# Altium PCB External_Camera_HAT.PcbDoc (part 1 of 3)
Units mm, origin at the board's own origin, x right, y up, seen from the top; angles counter-clockwise.
Board outline 65 x 56 mm, 4 copper layers (Top Layer, GND Top, GND Bottom, Bottom Layer), stack 1.586 mm thick; 123 components, 112 nets, 537 pads, 357 vias.
Unrouted connection lines stored in the file: 85.
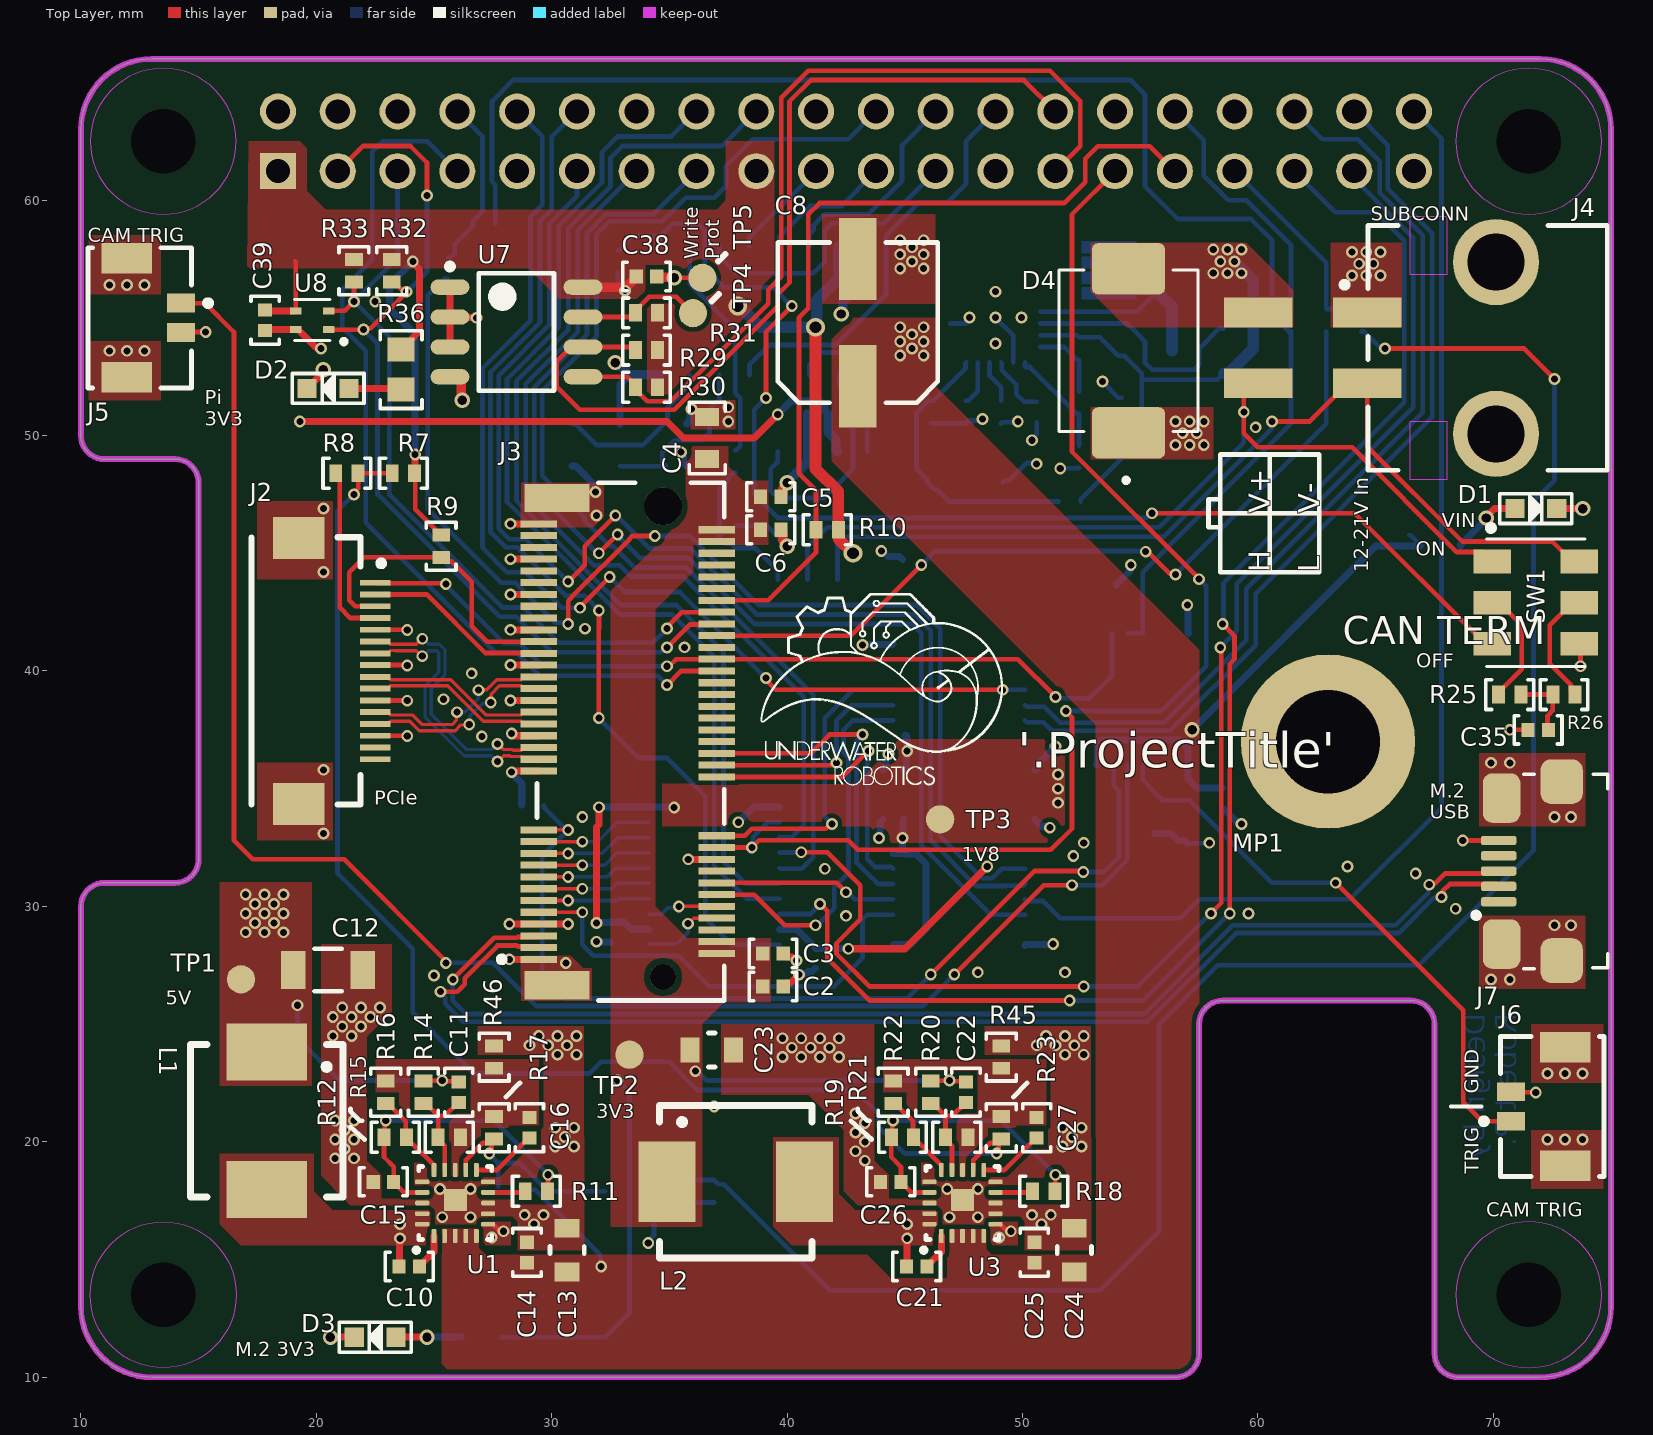
[diagram p0: Top Layer view]
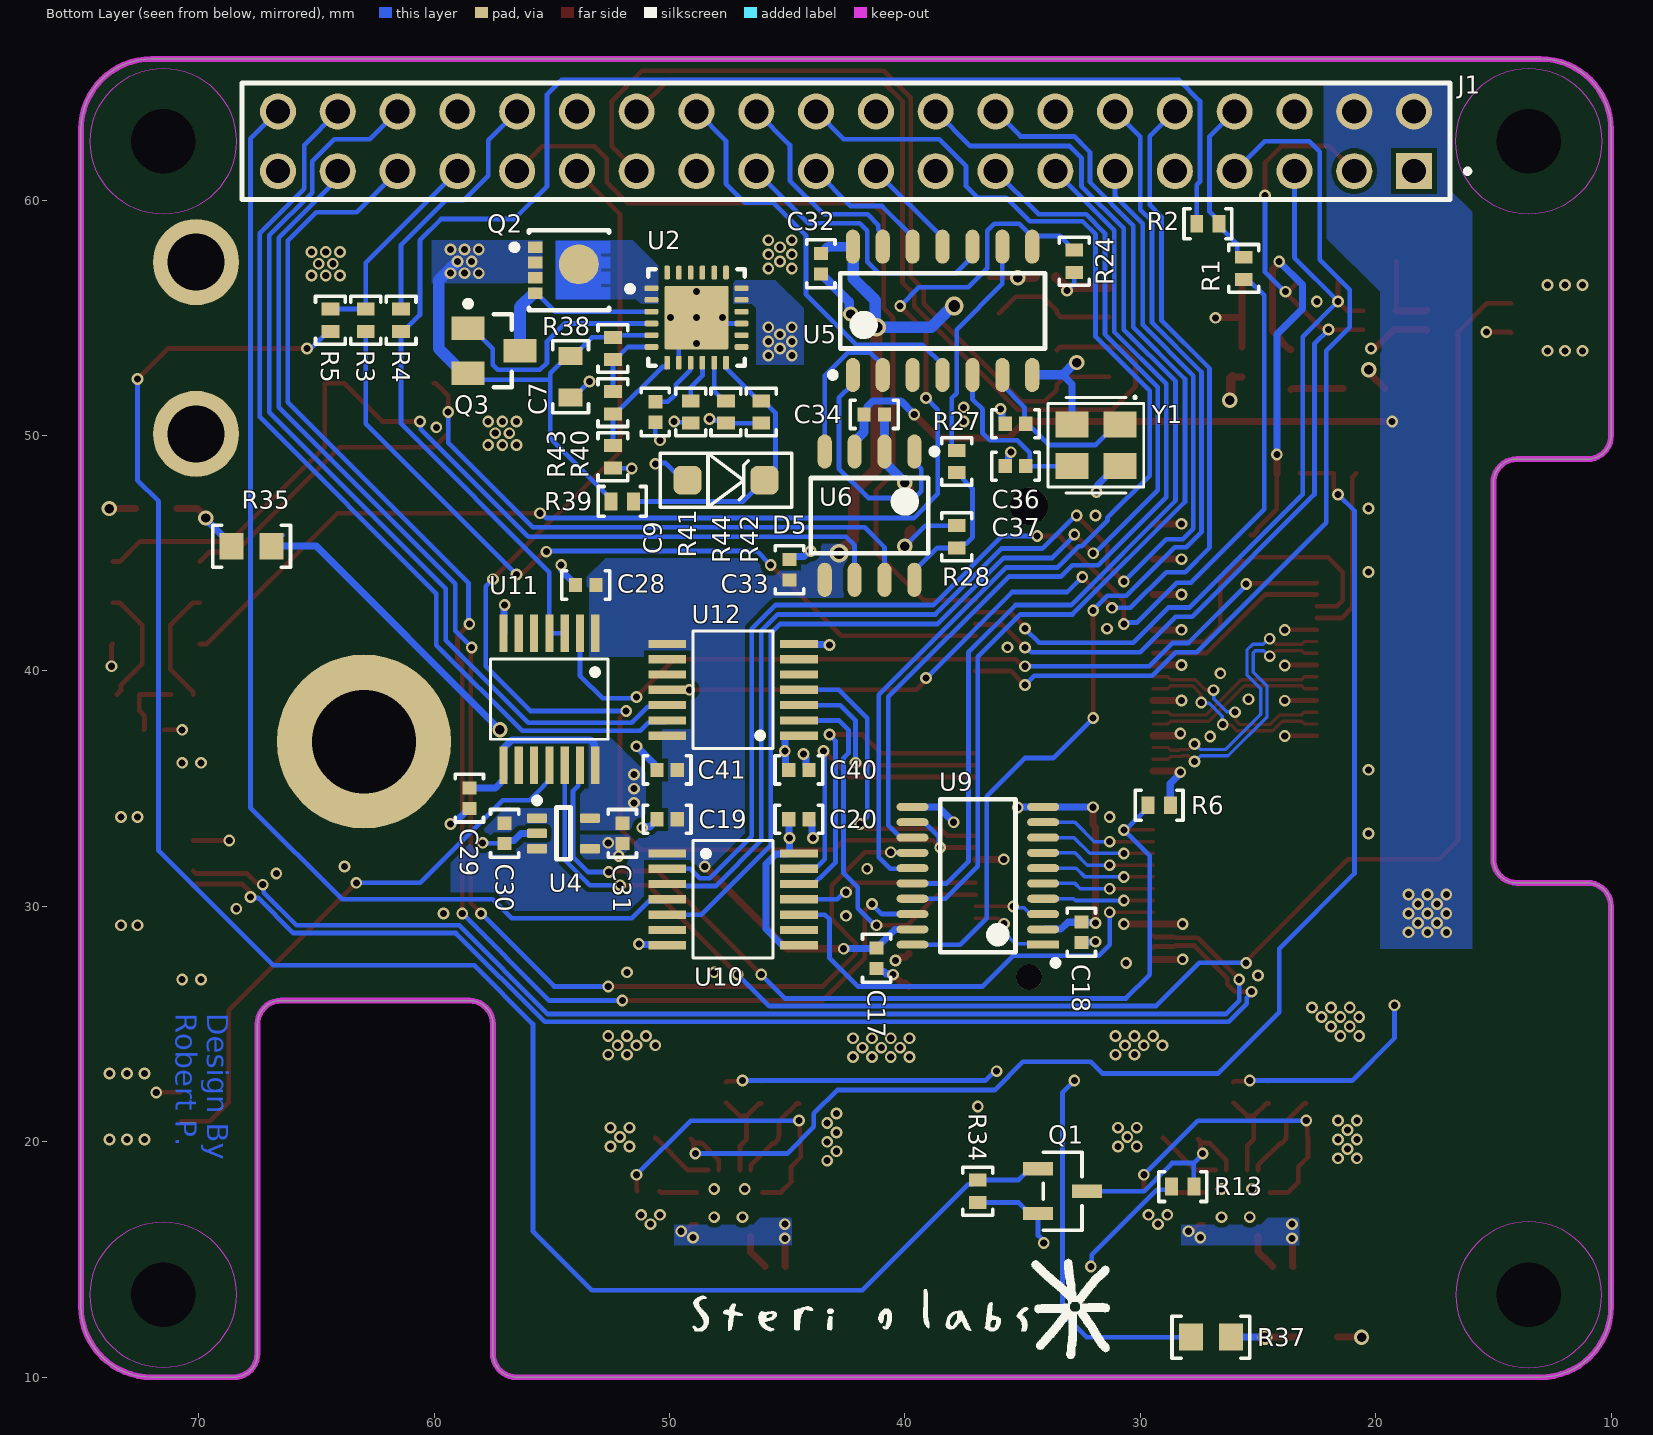
[diagram p1: Bottom Layer view, seen from below]
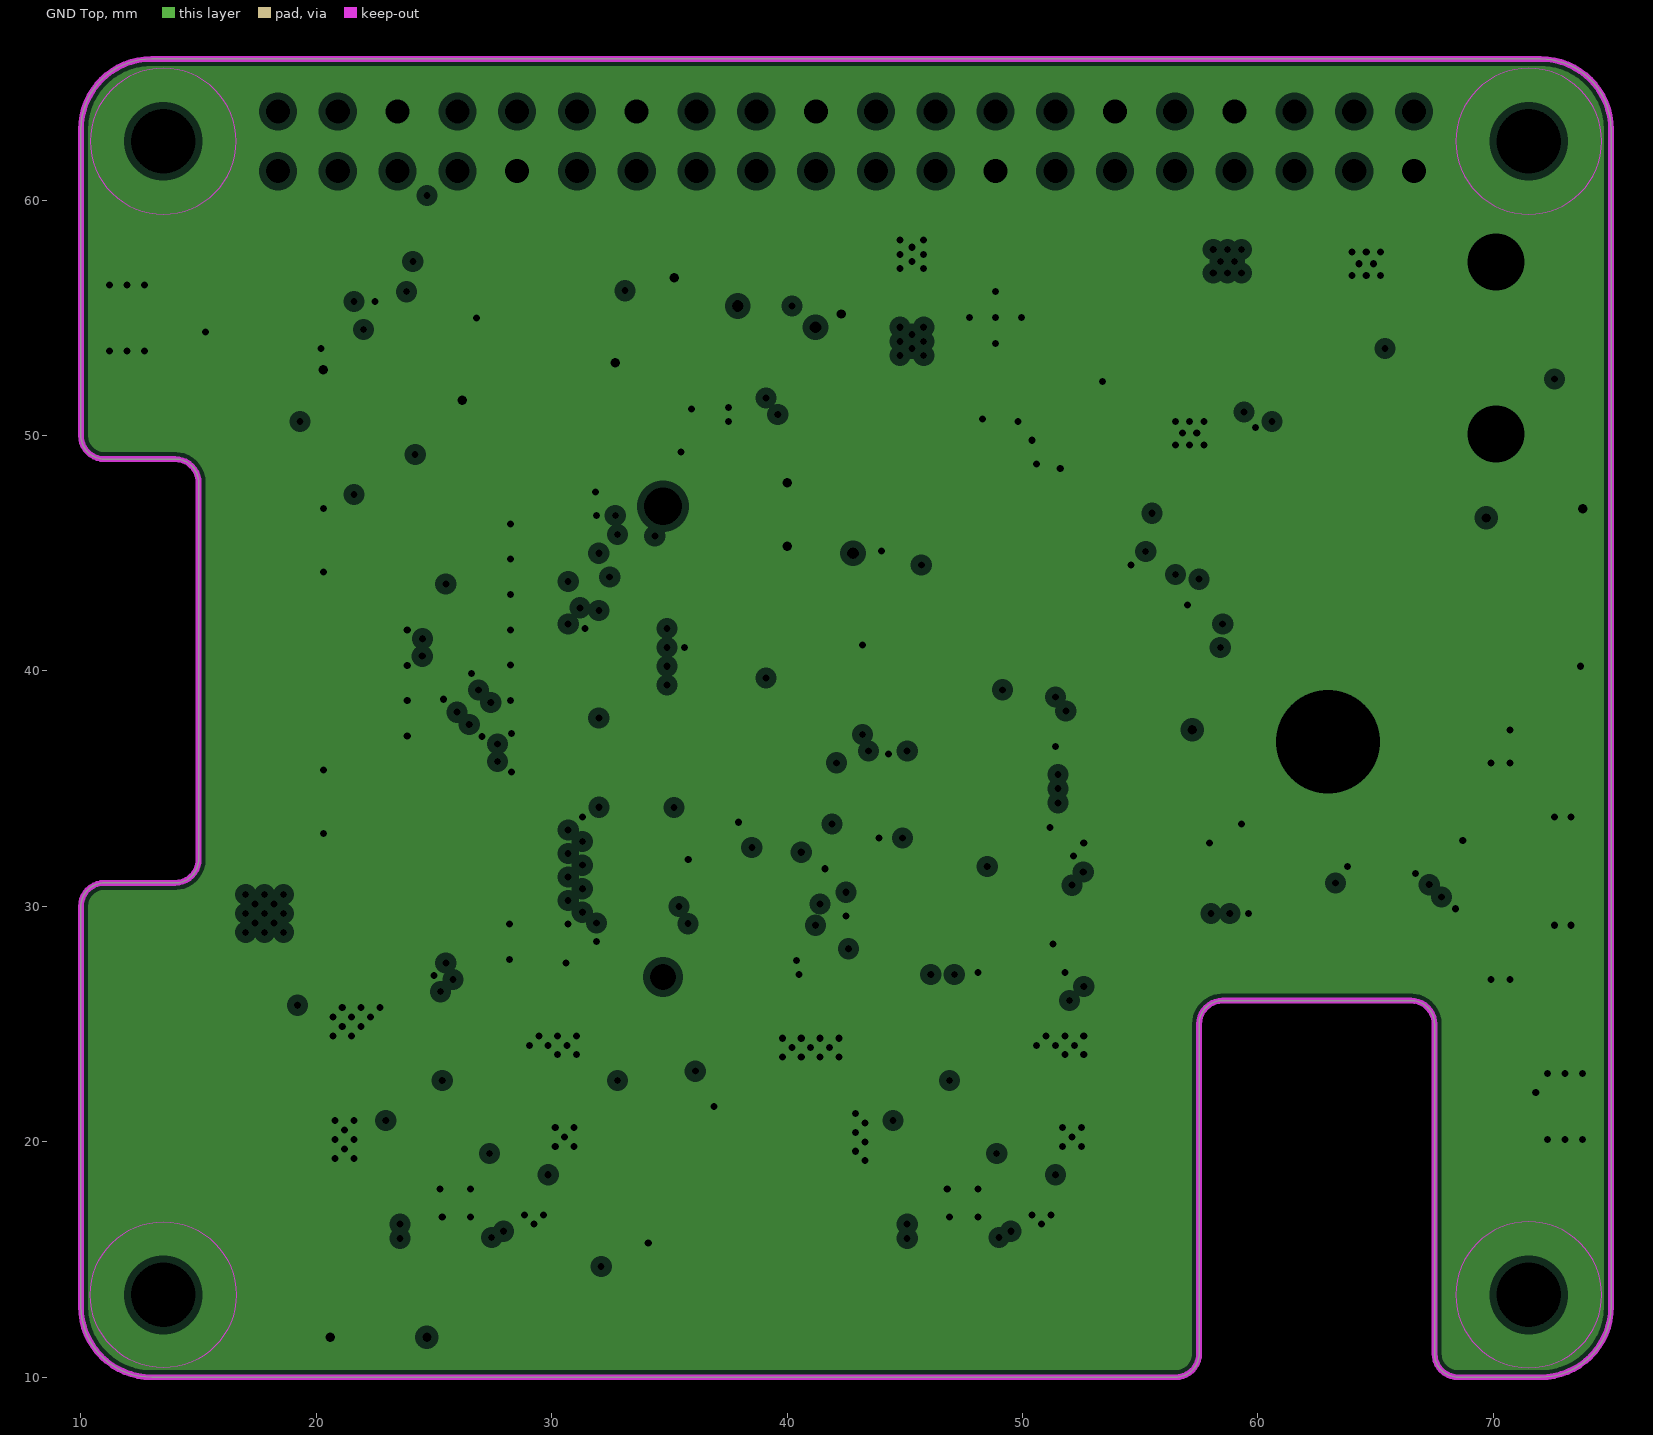
[diagram p2: GND Top, clearances drawn from the general rule]
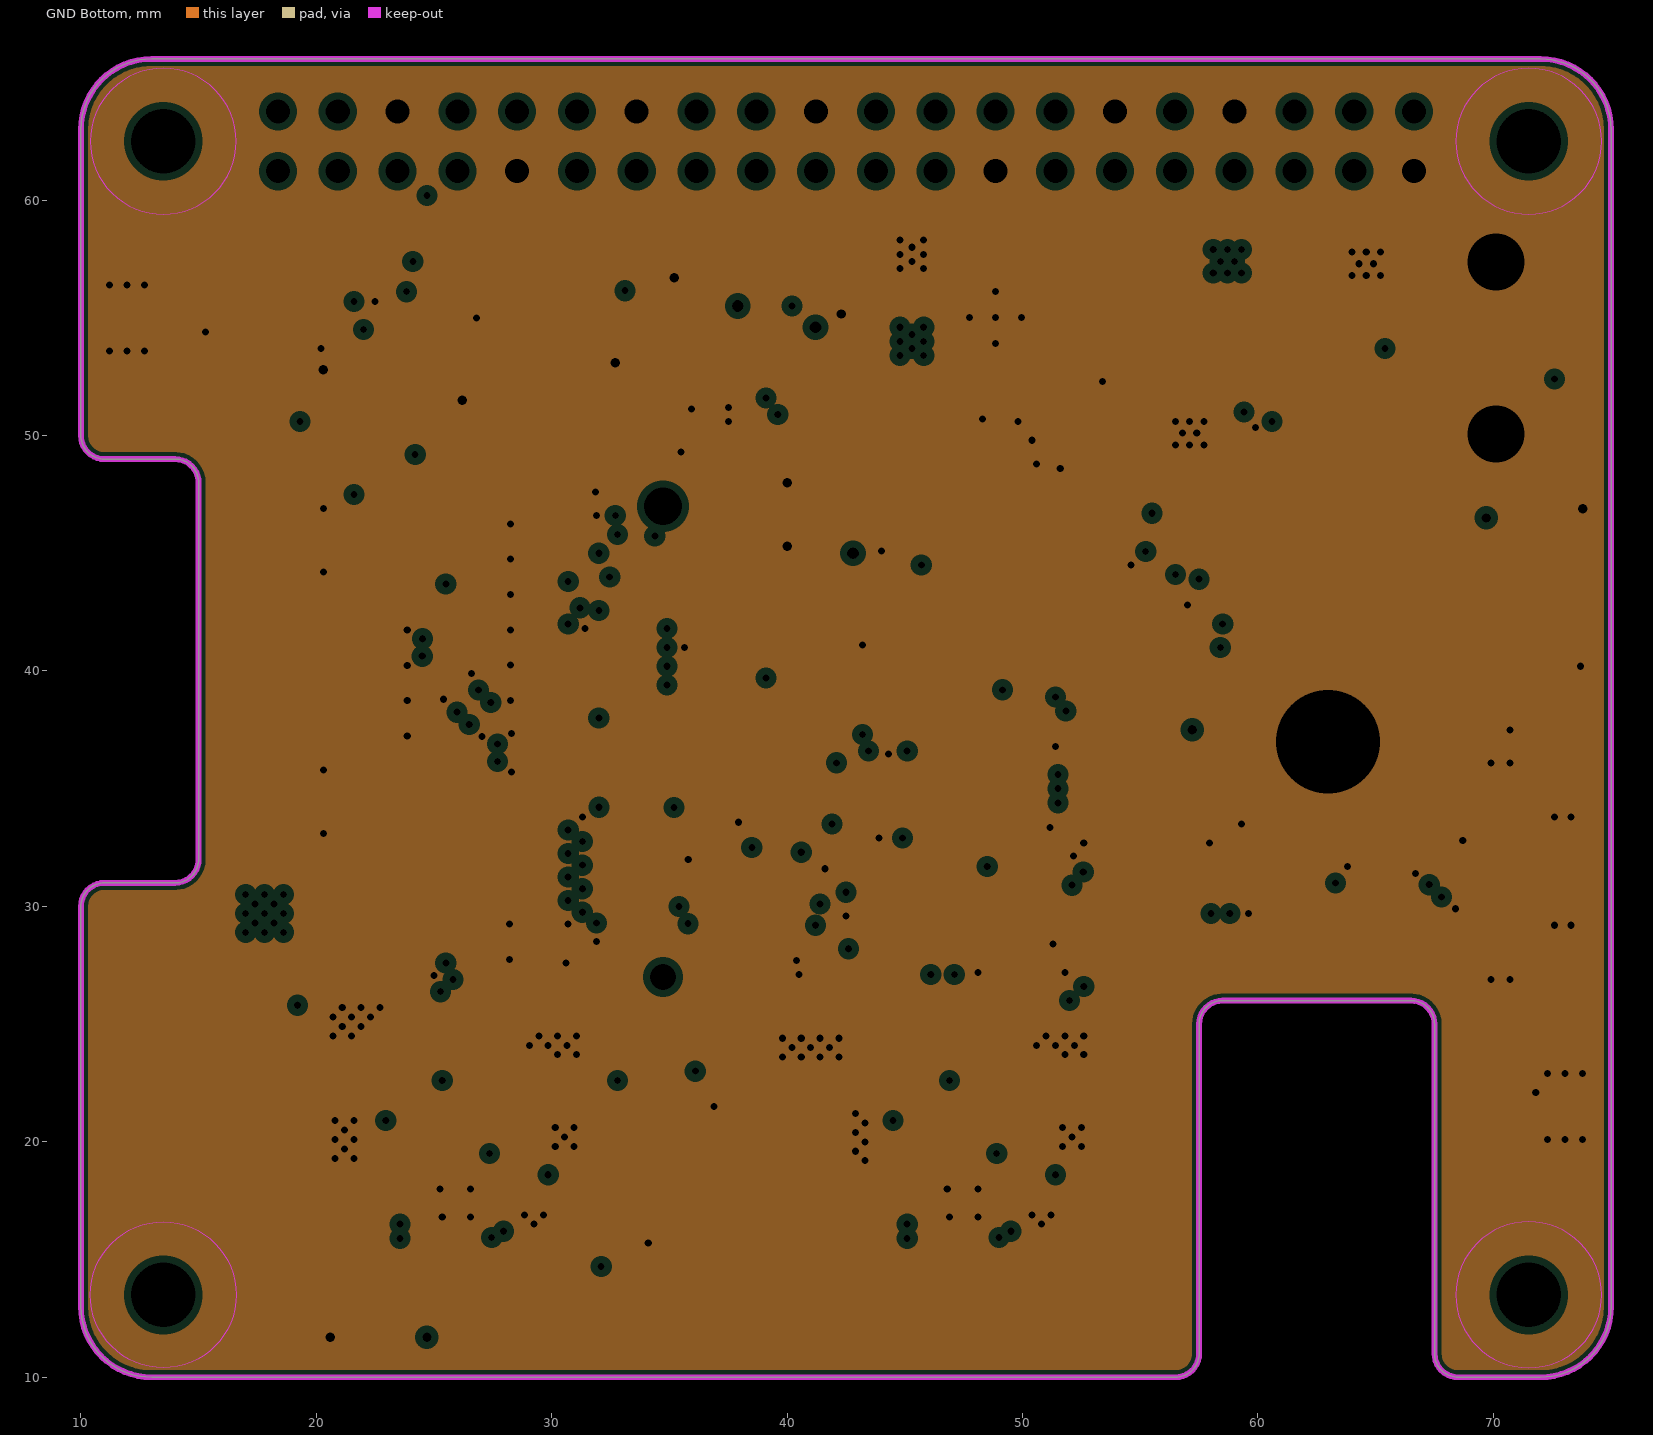
[diagram p3: GND Bottom, clearances drawn from the general rule]
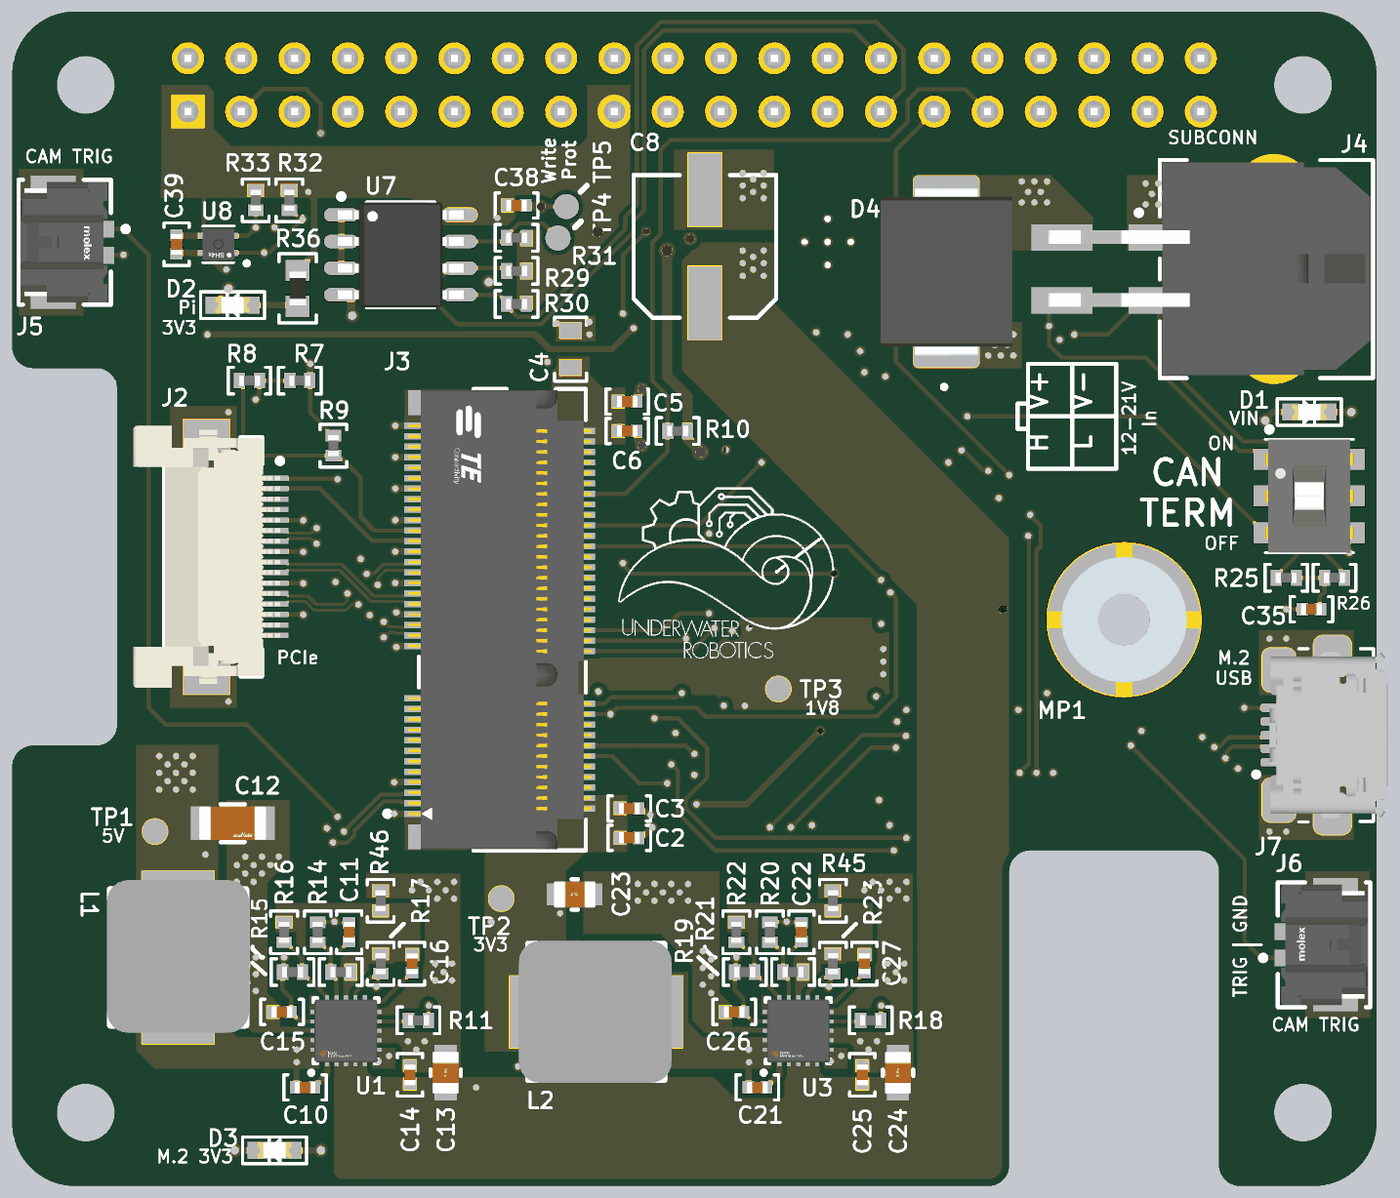
[diagram p5: 3D render of the assembled board from above, using the file's embedded part models]
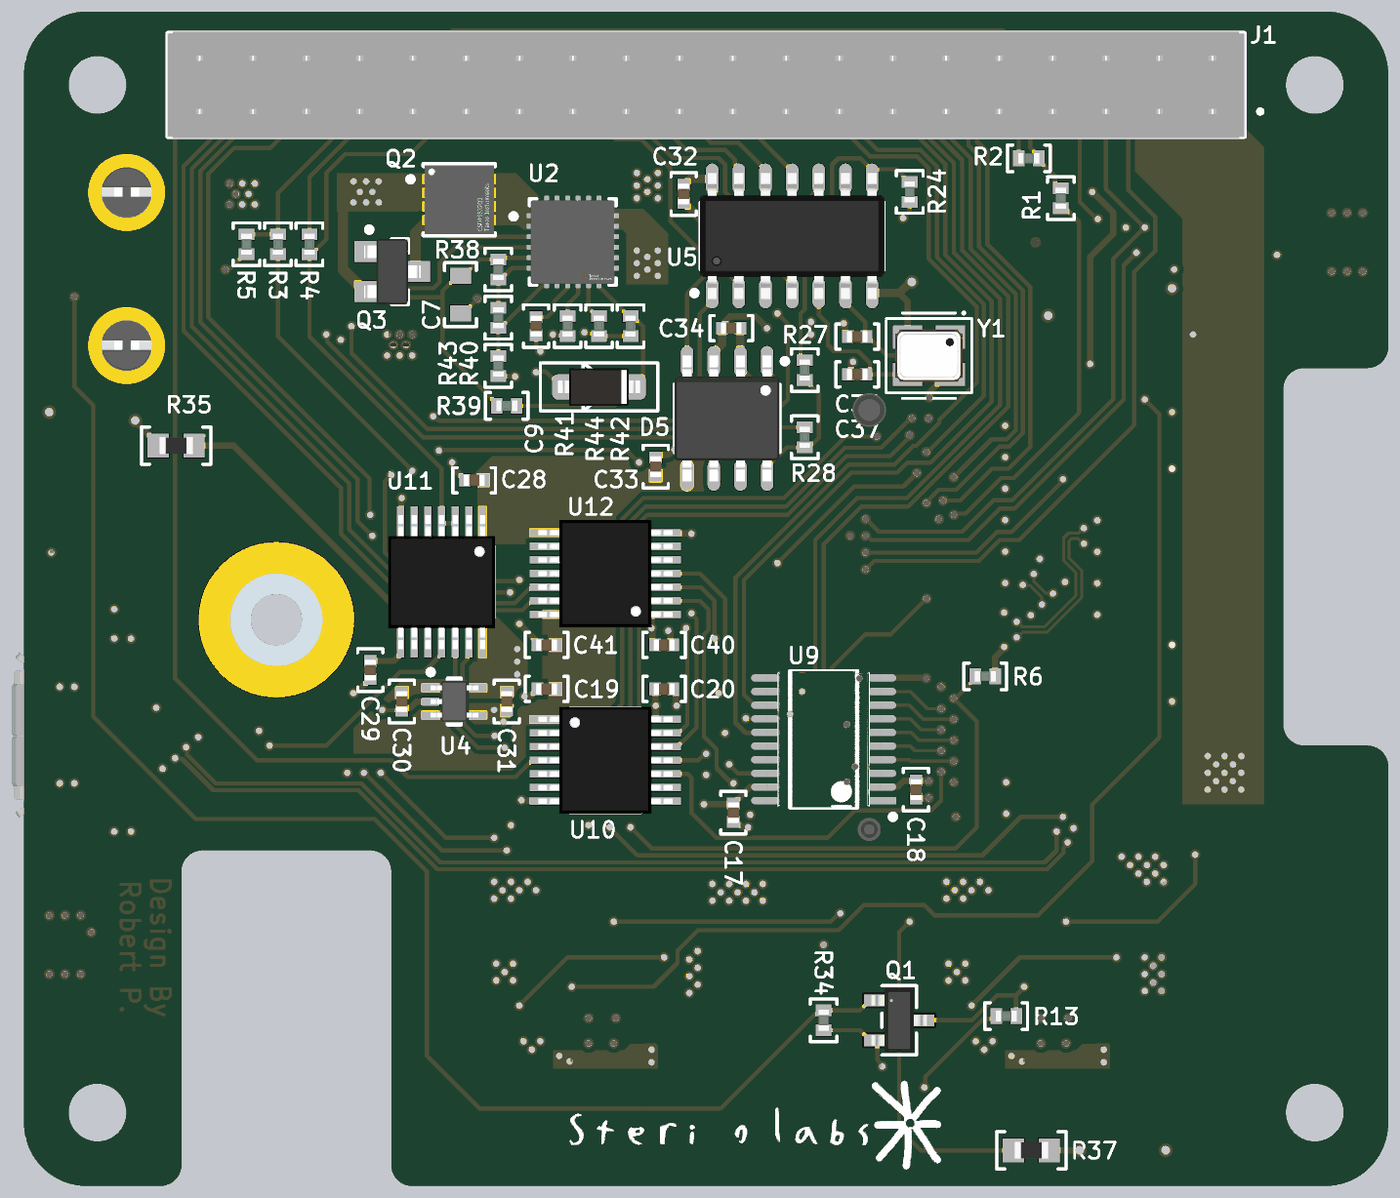
[diagram p6: 3D render of the assembled board from below, using the file's embedded part models]

## Layer stack, top to bottom
Top Solder: solder mask 0.0305, SM-001, Dk 3.8
Top Layer: signal copper 0.035
Dielectric 1: prepreg 0.2104, 7628, Dk 4.4
GND Top: plane copper 0.0152, net GND
Dielectric 2: core 1.065, FR4 TG 135-140, Dk 4.6
GND Bottom: plane copper 0.0152, net GND
Dielectric 3: prepreg 0.2104, 7628, Dk 4.4
Bottom Layer: signal copper 0.035
Bottom Solder: solder mask 0.0305, SM-001, Dk 3.8

## Board outline
13,10 cw(c13,13) 10,13 10,30 cw(c11,30) 11,31 14,31 ccw(c14,32) 15,32 15,48 ccw(c14,48) 14,49 11,49 cw(c11,50) 10,50 10,63 cw(c13,63) 13,66 72,66 cw(c72,63) 75,63 75,13 cw(c72,13) 72,10 68.5,10 cw(c68.5,11) 67.5,11 67.5,25 ccw(c66.5,25) 66.5,26 58.5,26 ccw(c58.5,25) 57.5,25 57.5,11 cw(c56.5,11) 56.5,10

## Design rules (kind name [scope] priority, off if disabled: settings)
AcuteAngle [All] p1: minimum=8.00000000000000E+0001 checktracksonly=FALSE
BoardOutlineClearance "BoardOutlineClearance JLCPCB" [Not OnSilkscreen] p1: gap=0.3 ignorepadtopadclearanceinfootprint=FALSE
BoardOutlineClearance "BoardOutlineClearance Silscreen JLCPCB" [(Not IsComponentPrimitive) AND OnSilkscreen] p2: gap=0.3 ignorepadtopadclearanceinfootprint=FALSE
Clearance "Clearance JLCPCB 4 layer" [All] p1: gap=0.2 ignorepadtopadclearanceinfootprint=FALSE except(0.09: Arc-Arc Arc-Track Track-Track; 0.127: Arc-SMDPad Arc-Via Track-SMDPad Track-Via SMDPad-SMDPad; 0.24: THPad-THPad THPad-Via Via-Via; 0.254: Arc-Hole Track-Hole SMDPad-Hole THPad-Hole Via-Hole Fill-Hole Poly-Hole Region-Hole Text-Hole)
DiffPairsRouting "Diff Pairs USB 2.0" [InDifferentialPairClass('USB 2.0')] p1: maxlimit=0.127 minlimit=0.127 mostfreqgap=0.127 toplayer_minwidth=0.2 toplayer_maxwidth=0.2 toplayer_prefwidth=0.2 bottomlayer_minwidth=0.2 bottomlayer_maxwidth=0.2 bottomlayer_prefwidth=0.2 impedanceprofiledriven=TRUE impedanceprofileid={9C1C01C3-81FD-4AE1-9E3D-BC841176F5CA} impedanceprofilevalue=90.000000 maxuncoupledlength=12.7
DiffPairsRouting "Diff Pairs PCIe Gen 2" [InDifferentialPairClass('PCIe Gen 2')] p2: maxlimit=0.127 minlimit=0.127 mostfreqgap=0.127 toplayer_minwidth=0.14 toplayer_maxwidth=0.14 toplayer_prefwidth=0.14 bottomlayer_minwidth=0.14 bottomlayer_maxwidth=0.14 bottomlayer_prefwidth=0.14 impedanceprofiledriven=TRUE impedanceprofileid={D86E5A41-F98B-413D-93FD-A6E48D035561} impedanceprofilevalue=100.000000 maxuncoupledlength=12.7
HoleSize "HoleSize JLCPCB Pad" [IsPad] p1: absolutevalues=TRUE maxlimit=6.3 minlimit=0.5 maxpercent=80.000 minpercent=20.000
HoleSize "HoleSize JLCPCB 4 layer Cheap" [All] p2: absolutevalues=TRUE maxlimit=6.3 minlimit=0.3 maxpercent=80.000 minpercent=20.000
HoleToHoleClearance "HoleToHoleClearance JLCPCB Same Net" [All] p1: gap=0.254 allowstackedmicrovias=TRUE
MinimumAnnularRing "MinimumAnnularRing JLCPCB Via" [All] p1: minimumring=0.075
MinimumAnnularRing "MinimumAnnularRing JLCPCB Pad" [IsPad] p2: minimumring=0.25
MinimumAnnularRing "MinimumAnnularRing JLCPCB 1oz" [All] p3: minimumring=0.13
MinimumSolderMaskSliver "MinimumSolderMaskSliver JLCPCB" [All] p1: minsoldermaskwidth=0.1
PlaneClearance [All] p1: clearance=0.3
PlaneConnect [All] p1: planeconnectstyle=Direct reliefexpansion=0.508 reliefentries=4 reliefconductorwidth=0.254 reliefairgap=0.254
PolygonConnect [All] p1: connectstyle=Direct reliefconductorwidth=0.381 reliefentries=4 polygonreliefangle="45 Angle" airgapwidth=0.254
RoutingVias "RoutingVias JLCPCB 4 layer" [All] p1: holewidth=0.5 width=1 viastyle="Through Hole" minholewidth=0.3 minwidth=0.45 maxholewidth=1.27 maxwidth=2.032 useviatemplates=TRUE viatemplateguid#1={1FF1CE2E-D4DA-45DD-BA18-462DD51CCE8B} viatemplateguid#2={A26B80D9-3972-439C-BF20-AF114F6C39ED} viatemplateguid#3={94EF3918-7136-44E3-8D4D-2DFBB820EAE1} viatemplatename#1=v50h30m0mx0(Tol13-8) viatemplatename#2=v65h40m0mx0(Tol13-8) viatemplatename#3=v80h50m0mx0(Tol13-8)
SilkToSilkClearance [All] p1: silktosilkclearance=0.076
SilkToSolderMaskClearance "SilkToSolderMaskClearance JLCPCB" [IsPad] p1: minsilkscreentomaskgap=0.15 clearancetoexposedcopper=TRUE
SolderMaskExpansion "SolderMaskExpansion JLCPCB" [All] p1: expansion=0.038 istentingtop=FALSE
UnRoutedNet [All] p1: checkbadconnections=TRUE
Width "Width JLCPCB 4 layer" [All] p1: maxlimit=5 minlimit=0.09 preferedwidth=0.25 minimp=50.000000 maximp=50.000000 favimp=50.000000
21 further rules are at their usual default settings.

## Classes and differential pairs
differential pair class "USB 2.0": M2_USB
differential pair class "PCIe Gen 2": PCIE_CLK PCIE_RX PCIE_TX
component class External_Camera_HAT_Regulators: C7 C9 C10 C11 C12 C13 C14 C15 C16 C21 C22 C23 C24 C25 C26 C27 C30 C31 D4 D5 L1 L2 Q2 Q3 R11 R12 R13 R14 R15 R16 R17 R18 R19 R20 R21 R22 R23 R38 R39 R40 R41 R42 R43 R44 R45 R46 TP1 TP2 TP3 U1 U2 U3 U4
component class External_Camera_HAT_Peripherals: C32 C33 C34 C35 C36 C37 C38 C39 D1 D2 D3 Q1 R24 R25 R26 R27 R28 R29 R30 R31 R32 R33 R34 R35 R36 R37 SW1 TP4 TP5 U5 U6 U7 U8 Y1
component class External_Camera_HAT_LvlShifters: C17 C18 C19 C20 C28 C29 C40 C41 U9 U10 U11 U12
component class External_Camera_HAT_Connectors: C2 C3 C4 C5 C6 J1 J2 J3 J4 J5 J6 J7 MP1 R1 R2 R3 R4 R5 R6 R7 R8 R9 R10
differential pair PCIE_TX: +PCIE_TX_P -PCIE_TX_N
differential pair PCIE_RX: +PCIE_RX_P -PCIE_RX_N
differential pair PCIE_CLK: +PCIE_CLK_P -PCIE_CLK_N
differential pair M2_USB: +M2_USB_P -M2_USB_N

## Components (designator, comment, footprint, x,y, rotation, side; value= is the part's Value field where it differs from the comment)
C2 "1uF Ceramic 16V" CAPACITOR_0402 39.4,26.6 r0 top value=1uF
C3 "100nF Ceramic 25V" CAPACITOR_0402 39.4,28 r0 top value=0.1uF
C4 "10uF Ceramic 6.3V" CAPACITOR_0603 36.6,49.9 r90 top
C5 "1uF Ceramic 16V" CAPACITOR_0402 39.3,47.4 r0 top value=1uF
C6 "100nF Ceramic 25V" CAPACITOR_0402 39.3,46 r0 top value=0.1uF
C7 "1uF Ceramic 25V" CAPACITOR_0603 54.2,52.5 r270 bottom value=1uF
C8 "UUD1E101MCL1GS" NIC-CAPA2-6.3X7.7_V 43,54.8 r90 top
C9 "22nF Ceramic 25V" CAPACITOR_0402 50.6,51 r270 bottom value=22nF
C10 "100nF Ceramic 25V" CAPACITOR_0402 23.95,14.7 r0 top value=0.1uF
C11 "100pF Ceramic 25V" CAPACITOR_0402 26.05,22.1 r270 top value=100pF
C12 "GRM31CR61A476KE15L" FP-GRM31C-0_2-e0_3_0_8-MFG 20.5,27.3 r0 top
C13 "C2012X5R1V226M125AC" FP-C2012-125-0_2-MFG 30.65,15.4 r90 top
C14 "100nF Ceramic 25V" CAPACITOR_0402 28.95,15.3 r90 top value=0.1uF
C15 "1uF Ceramic 16V" CAPACITOR_0402 22.85,18.3 r180 top value=1uF
C16 "100nF Ceramic 25V" CAPACITOR_0402 29.05,20.6 r90 top value=0.1uF
C17 "100nF Ceramic 25V" CAPACITOR_0402 41.2,27.8 r270 bottom value=0.1uF
C18 "100nF Ceramic 25V" CAPACITOR_0402 32.5,28.9 r270 bottom value=0.1uF
C19 "100nF Ceramic 25V" CAPACITOR_0402 50.1,33.7 r0 bottom value=0.1uF
C20 "100nF Ceramic 25V" CAPACITOR_0402 44.5,33.7 r180 bottom value=0.1uF
C21 "100nF Ceramic 25V" CAPACITOR_0402 45.5,14.7 r0 top value=0.1uF
C22 "100pF Ceramic 25V" CAPACITOR_0402 47.6,22.1 r270 top value=100pF
C23 "C2012X5R1V226M125AC" FP-C2012-125-0_2-MFG 36.8,23.9 r0 top
C24 "C2012X5R1V226M125AC" FP-C2012-125-0_2-MFG 52.2,15.4 r90 top
C25 "100nF Ceramic 25V" CAPACITOR_0402 50.5,15.3 r90 top value=0.1uF
C26 "1uF Ceramic 16V" CAPACITOR_0402 44.4,18.3 r180 top value=1uF
C27 "100nF Ceramic 25V" CAPACITOR_0402 50.6,20.6 r90 top value=0.1uF
C28 "100nF Ceramic 25V" CAPACITOR_0402 53.55,43.65 r0 bottom value=0.1uF
C29 "100nF Ceramic 25V" CAPACITOR_0402 58.5,34.6 r270 bottom value=0.1uF
C30 "1uF Ceramic 16V" CAPACITOR_0402 57,33.1 r270 bottom value=1uF
C31 "1uF Ceramic 16V" CAPACITOR_0402 52,33.1 r270 bottom value=1uF
C32 "100nF Ceramic 25V" CAPACITOR_0402 43.568,57.303 r270 bottom value=0.1uF
C33 "100nF Ceramic 25V" CAPACITOR_0402 44.9,44.3 r90 bottom value=0.1uF
C34 "100nF Ceramic 25V" CAPACITOR_0402 41.3,50.9 r180 bottom value=0.1uF
C35 "4700pF Ceramic 25V" CAPACITOR_0402 71.9,37.5 r0 top value=4.7nF
C36 "27pF Ceramic 50V" CAPACITOR_0402 35.3,50.5 r0 bottom value=27pF
C37 "27pF Ceramic 50V" CAPACITOR_0402 35.3,48.7 r0 bottom value=27pF
C38 "100nF Ceramic 25V" CAPACITOR_0402 34.025,56.754 r0 top value=0.1uF
C39 "100nF Ceramic 25V" CAPACITOR_0402 17.825,54.9 r270 top value=0.1uF
C40 "100nF Ceramic 25V" CAPACITOR_0402 44.5,35.8 r180 bottom value=0.1uF
C41 "100nF Ceramic 25V" CAPACITOR_0402 50.1,35.8 r0 bottom value=0.1uF
D1 "150060GS75000" LED_0603 71.8,46.9 r0 top
D2 "150060GS75000" LED_0603 20.5,52 r180 top
D3 "150060GS75000" LED_0603 22.5,11.7 r180 top
D4 "SMCJ33CA" DIOM7959X262N 54.5,53.6 r90 top
D5 "Zener_Diode_3.3V_250mW_1" SOD-123 47.6,48.1 r180 bottom
J1 "ESQ-120-XX-X-D-XX" SAMTEC_ESQ-120-XX-X-D-XX 42.5,62.5 r180 bottom locked
J2 "FFC 0.5MM TOP R/A" FH12A-16S-0.5SH(55) 22.5,40 r90 top locked
J3 "2199230-4" FP-2199230-4-MFG 33.35,37 r90 top locked
J4 "43045-0406" FP-43045-0406-MFG 69.756,53.721 r90 top locked
J5 "505567-0281" FP-505567-0281-MFG 12.5,55 r90 top locked
J6 "505567-0281" FP-505567-0281-MFG 72.5,21.5 r270 top locked
J7 "USB_MICRO R/A" CONN_MINIUSB 72.9,31.5 r90 top
L1 "1.5uH Shielded" IHLP2525EZ 17.9,20.9 r270 top value=1.5uH
L2 "1.5uH Shielded" IHLP2525EZ 37.821,18.3 r0 top value=1.5uH
MP1 "M3 x 2.5mm" 78614025360 62.975,37 r180 top locked
Q1 "MOSFET N-CH 30V 5.8A SOT-23-3" SOT-23-3 33.3,17.9 r270 bottom
Q2 "CSD19537Q3" FP-DQG0008A-MFG 54.265,57.025 r270 bottom
Q3 "BSS138" FAIR-SOT23-3_V 57.453,53.6 r180 bottom
R1 "0 Ohm 1% 1/16W" RESISTOR_0402 25.6,57.1 r90 bottom
R2 "0 Ohm 1% 1/16W" RESISTOR_0402 27.125,59 r180 bottom
R3 "0 Ohm 1% 1/16W" RESISTOR_0402 62.9,54.9 r270 bottom
R4 "0 Ohm 1% 1/16W" RESISTOR_0402 61.4,54.9 r90 bottom
R5 "0 Ohm 1% 1/16W" RESISTOR_0402 64.4,54.9 r270 bottom
R6 "10k Ohm 1% 1/16W" RESISTOR_0402 29.2,34.3 r180 bottom
R7 "0 Ohm 1% 1/16W" RESISTOR_0402 23.7,48.4 r180 top
R8 "0 Ohm 1% 1/16W" RESISTOR_0402 21.3,48.4 r0 top
R9 "2.2k Ohm 1% 1/16W" RESISTOR_0402 25.3,45.3 r270 top
R10 "10k Ohm 1% 1/16W" RESISTOR_0402 41.7,46 r180 top
R11 "100k Ohm 1% 1/16W" RESISTOR_0402 29.35,17.9 r180 top
R12 "160k Ohm 1% 1/16W" RESISTOR_0402 23.35,20.2 r0 top
R13 "330k Ohm 1% 1/16W" RESISTOR_0402 28.2,18.1 r180 bottom
R14 "113k Ohm 1% 1/16W" RESISTOR_0402 24.55,22.1 r270 top
R15 "15k Ohm 1% 1/16W" RESISTOR_0402 25.65,20.2 r0 top
R16 "56k Ohm 1% 1/16W" RESISTOR_0402 22.95,22.1 r90 top
R17 "56k Ohm 1% 1/16W" RESISTOR_0402 27.55,20.6 r90 top
R18 "100k Ohm 1% 1/16W" RESISTOR_0402 50.9,17.9 r180 top
R19 "160k Ohm 1% 1/16W" RESISTOR_0402 44.9,20.2 r0 top
R20 "90.9k Ohm 1% 1/16W" RESISTOR_0402 46.1,22.1 r270 top
R21 "20k Ohm 1% 1/16W" RESISTOR_0402 47.2,20.2 r0 top
R22 "56k Ohm 1% 1/16W" RESISTOR_0402 44.5,22.1 r90 top
R23 "100k Ohm 1% 1/16W" RESISTOR_0402 49.1,20.6 r90 top
R24 "10k Ohm 1% 1/16W" RESISTOR_0402 32.8,57.4 r90 bottom
R25 "60.4 Ohm 1% 1/16W" RESISTOR_0402 70.7,39 r0 top
R26 "60.4 Ohm 1% 1/16W" RESISTOR_0402 73,39 r180 top
R27 "0 Ohm 1% 1/16W" RESISTOR_0402 37.8,48.9 r90 bottom
R28 "10k Ohm 1% 1/16W" RESISTOR_0402 37.8,45.7 r90 bottom
R29 "3.9k Ohm 1% 1/16W" RESISTOR_0402 34.025,53.632 r180 top
R30 "3.9k Ohm 1% 1/16W" RESISTOR_0402 34.025,52.054 r180 top
R31 "1k Ohm 1% 1/16W" RESISTOR_0402 34.025,55.21 r180 top
R32 "3.9k Ohm 1% 1/16W" RESISTOR_0402 23.2,57 r270 top
R33 "3.9k Ohm 1% 1/16W" RESISTOR_0402 21.6,57 r270 top
R34 "10k Ohm 1% 1/16W" RESISTOR_0402 36.9,17.9 r270 bottom
R35 "470k Ohm 5% 1/10W" RESISTOR_0603 67.749,45.3 r0 bottom
R36 "4.7k Ohm 5% 1/10W" RESISTOR_0603 23.6,52.8 r270 top
R37 "4.7k Ohm 5% 1/10W" RESISTOR_0603 27,11.7 r180 bottom
R38 "1M Ohm 1% 1/16W" RESISTOR_0402 52.4,53.7 r270 bottom
R39 "330k Ohm 1% 1/16W" RESISTOR_0402 52,47.2 r180 bottom
R40 "113k Ohm 1% 1/16W" RESISTOR_0402 52.4,51.4 r270 bottom
R41 "3.09k Ohm 1% 1/16W" RESISTOR_0402 49.1,51 r270 bottom
R42 "56k Ohm 1% 1/16W" RESISTOR_0402 46.1,51 r270 bottom
R43 "56k Ohm 1% 1/16W" RESISTOR_0402 52.4,49.1 r270 bottom
R44 "0 Ohm 1% 1/16W" RESISTOR_0402 47.6,51 r270 bottom
R45 "0 Ohm 1% 1/16W" RESISTOR_0402 49.1,23.6 r90 top
R46 "0 Ohm 1% 1/16W" RESISTOR_0402 27.55,23.6 r90 top
SW1 "Switch DPDT" CAS-220TA 71.8,42.9 r270 top
TP1 "PCB Test Point" TESTPOINT_1.2MM 16.8,26.9 r180 top
TP2 "PCB Test Point" TESTPOINT_1.2MM 33.3,23.7 r180 top
TP3 "PCB Test Point" TESTPOINT_1.2MM 46.5,33.7 r180 top
TP4 "Write Enable" TESTPOINT_1.2MM 36,55.2 r180 top
TP5 "PCB Test Point" TESTPOINT_1.2MM 36.4,56.7 r180 top
U1 "TPS51397ARJER" FP-RJE0020B-MFG 25.9,17.4 r90 top
U2 "TPS26630RGET" FP-RGE0024H-MFG 48.85,55.013 r180 bottom
U3 "TPS51397ARJER" FP-RJE0020B-MFG 47.45,17.4 r90 top
U4 "TLV70018DCKR" DCK0005A_N 54.5,33.1 r180 bottom
U5 "MCP2517FD" SOIC-14 38.4,55.3 r90 bottom
U6 "CAN Transceiver" SOIC-8 41.5,46.6 r270 bottom
U7 "CAT24C32WI-GT3" ONSC-SOIC-8-751BD-01_M 28.5,54.4 r0 top
U8 "SHT14 SENSOR" XDCR_SHT41-AD1B-R2 19.825,54.9 r180 top
U9 "TXS0108EPWR" FP-PW0020A-IPC_C 36.9,31.3 r0 bottom
U10 "TXU0104QPWRQ1" "PW (R-PDSO-G14)" 47.3,30.3 r270 bottom
U11 "TXU0104QPWRQ1" "PW (R-PDSO-G14)" 55.1,38.8 r0 bottom
U12 "TXU0104QPWRQ1" "PW (R-PDSO-G14)" 47.3,39.2 r90 bottom
Y1 "CRYSTAL 20.0000MHZ 18PF SMD" "4-SMD, NO LEAD CRYSTAL 3.2x2.5mm" 30.868,50.478 r0 bottom

## Footprints (in the part's own frame and the unit in brackets; to place one, negate y for a bottom-side part, rotate by r counter-clockwise, add the part's x,y. Pads: shape width x height; smd on the part's side, far side on the other; paste and mask are expansions set on the pad)
"4-SMD, NO LEAD CRYSTAL 3.2x2.5mm" [mm]
  rrect0% 1.4x1.1 smd: 1(0,0) 2(2.032,0) 3(2.032,1.778) 4(0,1.778)
  silkscreen extent -1.02,-1.2 3.05,2.92, body extent -0.58,-0.36 2.62,2.14, height 0.82
78614025360 [mm] "M3 Thread Internal, Length 2.5mm"
  round 7.4 hole 4.4: 1(0,0)
  body extent -3,-3 3,3, height 2.5
CAPACITOR_0402 [mm]
  rect 0.56x0.6 smd: 1(-0.435,0) 2(0.435,0)
  silkscreen extent -1.02,-0.6 1.02,0.6, body extent -0.5,-0.28 0.5,0.27, height 0.51
CAPACITOR_0603 [mil] "CAPACITOR 0603"
  rect 30x40 smd: 1(-35,0) 2(35,0)
  silkscreen extent -60,-30 60,30, body extent -31,-16 32,16, height 31
CAS-220TA [mm] "SWITCH SLIDE DPDT 100MA 6V"
  rrect0% 1x1.6 smd: 1(-1.75,-1.85) 2(0,-1.85) 3(1.75,-1.85) 4(-1.75,1.85) 5(0,1.85) 6(1.75,1.85)
  silkscreen extent -3.3,-2.1 2.7,2.1, body extent -2.7,-2.1 2.7,2.1, height 2.51
CONN_MINIUSB [mm] "USB2.0 Micro-B Receptacle SMD R/A"
  rrect50% 0.4x1.5 smd: 1(-1.3,2.675) 2(-0.65,2.675) 3(0,2.675) 4(0.65,2.675) 5(1.3,2.675)
  rrect50% 2.1x1.6 smd: 6(-3.1,2.55) 7(3.1,2.55)
  rrect50% 1.9x1.8 smd: 8(3.8,0) 9(-3.8,0)
  silkscreen extent -4.14,-1.96 4.11,3.75, body extent -3.96,-2.67 3.96,2.99, height 2.72
DCK0005A_N [mm] "SOT23, 5-Leads, Body 2.15x1.4mm, Pitch 0.65mm, IPC Medium Density"
  rrect25% 0.85x0.4 smd: 1(-1.125,0.65) 2(-1.125,0) 3(-1.125,-0.65) 4(1.125,-0.65) 5(1.125,0.65)
  silkscreen extent -1.25,-1.1 0.3,1.52, body extent -1.14,-1 1.14,1, height 0.94
DIOM7959X262N [mm]
  rrect25% 2.18x3.12 smd: 1(-3.485,0) 2(3.485,0)
  silkscreen extent -5.6,-2.95 3.43,2.95, body extent -4.03,-3.13 4.02,3.12, height 2.94
FAIR-SOT23-3_V [mm] "SOT23, 3-Leads, Body 3.12x1.5mm, Pitch 0.95mm"
  rect 1.4x1 smd: 1(-1.1,0.95) 2(-1.1,-0.95) 3(1.1,0)
  silkscreen extent -1.23,-1.55 0.75,2.12, body extent -1.35,-1.56 1.35,1.56, height 1.2
FH12A-16S-0.5SH(55) [mm]
  rect 0.25x1.3 smd mask+0.025: 1(3.75,0) 2(3.25,0) 3(2.75,0) 4(2.25,0) 5(1.75,0) 6(1.25,0) 7(0.75,0) 8(0.25,0) 9(-0.25,0) 10(-0.75,0) 11(-1.25,0) 12(-1.75,0) 13(-2.25,0) 14(-2.75,0) 15(-3.25,0) 16(-3.75,0)
  rect 1.8x2.2 smd: S1(5.65,3.25) S2(-5.65,3.25)
  silkscreen extent -5.68,-0.38 5.68,5.25, body extent -6.25,-0.25 6.25,6.75, height 2.05
FP-43045-0406-MFG [mm]
  rect 1.27x2.92 smd paste+0 mask+0: 1(1.5,5.115) 2(-1.5,5.115) 3(1.5,9.745) 4(-1.5,9.745)
  round 3.66 hole 2.41 paste-1000 mask+0: 5(-3.65,-0.355) 6(3.65,-0.355)
  Top Layer keep-out region: -5.575,1.705 -3.125,1.705 -3.125,3.305 -5.575,3.305
  Top Layer keep-out region: 3.125,1.705 5.575,1.705 5.575,3.305 3.125,3.305
  silkscreen extent -5.2,-5.08 5.2,6.2, body extent -5.58,-5.18 5.58,11.3, height 0.25
FP-505567-0281-MFG [mm]
  rect 0.8x1.2 smd paste+0 mask+0: 1(0.625,-1.75) 2(-0.625,-1.75)
  rect 1.3x2.15 smd paste+0 mask+0: 3(-2.525,0.545) 4(2.525,0.545)
  silkscreen extent -2.98,-3.03 2.98,2.2, body extent -3.27,-2.45 3.27,2.3, height 0.25
FP-2199230-4-MFG [mm]
  rect 0.3x1.55 smd paste+0 mask+0: 1(-9.25,3.9) 2(-9,-3.65) 3(-8.75,3.9) 4(-8.5,-3.65) 5(-8.25,3.9) 6(-8,-3.65) 7(-7.75,3.9) 8(-7.5,-3.65) 9(-7.25,3.9) 10(-7,-3.65) 11(-6.75,3.9) 12(-6.5,-3.65) 13(-6.25,3.9) 14(-6,-3.65) 15(-5.75,3.9) 16(-5.5,-3.65) 17(-5.25,3.9) 18(-5,-3.65) 19(-4.75,3.9) 20(-4.5,-3.65) 21(-4.25,3.9) 22(-4,-3.65) 23(-3.75,3.9) 32(-1.5,-3.65) 33(-1.25,3.9) 34(-1,-3.65) 35(-0.75,3.9) 36(-0.5,-3.65) 37(-0.25,3.9) 38(0,-3.65) 39(0.25,3.9) 40(0.5,-3.65) 41(0.75,3.9) 42(1,-3.65) 43(1.25,3.9) 44(1.5,-3.65) 45(1.75,3.9) 46(2,-3.65) 47(2.25,3.9) 48(2.5,-3.65) 49(2.75,3.9) 50(3,-3.65) 51(3.25,3.9) 52(3.5,-3.65) 53(3.75,3.9) 54(4,-3.65) 55(4.25,3.9) 56(4.5,-3.65) 57(4.75,3.9) 58(5,-3.65) 59(5.25,3.9) 60(5.5,-3.65) 61(5.75,3.9) 62(6,-3.65) 63(6.25,3.9) 64(6.5,-3.65) 65(6.75,3.9) 66(7,-3.65) 67(7.25,3.9) 68(7.5,-3.65) 69(7.75,3.9) 70(8,-3.65) 71(8.25,3.9) 72(8.5,-3.65) 73(8.75,3.9) 74(9,-3.65) 75(9.25,3.9)
  rect 1.2x2.75 smd paste+0 mask+0: 76(-10.35,3.125) 77(10.35,3.125)
  round 1.1 hole 1.1 unplated paste-1000 mask+0: ""(-10,-1.375)
  round 1.6 hole 1.6 unplated paste-1000 mask+0: ""(10,-1.375)
  silkscreen extent -11,-3.98 11,5.6, body extent -11.1,-4.52 11.1,4.77, height 0.25
FP-C2012-125-0_2-MFG [mm]
  rect 0.8x1.05 smd paste+0 mask+0: 1(-0.925,0) 2(0.925,0)
  silkscreen extent -0.15,-0.72 0.15,0.72, body extent -1,-0.63 1,0.63, height 1.45
FP-DQG0008A-MFG [mm]
  rect 0.5x0.63 smd paste-1000 mask+0: 1(-0.975,-1.435) 2(-0.325,-1.435) 3(0.325,-1.435) 4(0.975,-1.435)
  round 1.696 smd paste-1000 mask+0: 5-6-7-8(-0.25,0.415)
  Top Layer region: -1.225,-0.56 1.225,-0.56 1.225,1.75 0.725,1.75 0.725,1.34 0.575,1.34 0.575,1.75 0.075,1.75 0.075,1.34 -0.075,1.34 -0.075,1.75 -0.575,1.75 -0.575,1.34 -0.725,1.34 -0.725,1.75 -1.225,1.75 -1.225,-0.56
  silkscreen extent -1.7,-2.45 1.7,1.7, body extent -1.65,-1.65 1.65,1.65, height 1.18
FP-GRM31C-0_2-e0_3_0_8-MFG [mm]
  rect 1.05x1.6 smd paste+0 mask+0: 1(-1.475,0) 2(1.475,0)
  silkscreen extent -0.58,-0.9 0.58,0.9, body extent -2.1,-1 2.1,1, height 0.25
FP-PW0020A-IPC_C [mm]
  rect 1.355x0.341 smd paste+0 mask+0: 1(-2.775,2.925)
  rrect100% 1.355x0.341 smd paste+0 mask+0: 2(-2.775,2.275) 3(-2.775,1.625) 4(-2.775,0.975) 5(-2.775,0.325) 6(-2.775,-0.325) 7(-2.775,-0.975) 8(-2.775,-1.625) 9(-2.775,-2.275) 10(-2.775,-2.925) 11(2.775,-2.925) 12(2.775,-2.275) 13(2.775,-1.625) 14(2.775,-0.975) 15(2.775,-0.325) 16(2.775,0.325) 17(2.775,0.975) 18(2.775,1.625) 19(2.775,2.275) 20(2.775,2.925)
  silkscreen extent -3.42,-3.25 1.6,3.82, body extent -3.2,-3.25 3.2,3.25, height 1.2
FP-RGE0024H-MFG [mm]
  rrect42% 0.58x0.24 smd paste+0 mask+0: 1(-1.913,1.25) 2(-1.913,0.75) 3(-1.913,0.25) 4(-1.913,-0.25) 5(-1.913,-0.75) 6(-1.913,-1.25) 13(1.913,-1.25) 14(1.913,-0.75) 15(1.913,-0.25) 16(1.913,0.25) 17(1.913,0.75) 18(1.913,1.25)
  rrect42% 0.24x0.58 smd paste+0 mask+0: 7(-1.25,-1.913) 8(-0.75,-1.913) 9(-0.25,-1.913) 10(0.25,-1.913) 11(0.75,-1.913) 12(1.25,-1.913) 19(1.25,1.913) 20(0.75,1.913) 21(0.25,1.913) 22(-0.25,1.913) 23(-0.75,1.913) 24(-1.25,1.913)
  rrect4% 2.7x2.7 smd paste-1000 mask+0: 25(0,0)
  silkscreen extent -2.95,-2.05 2.05,2.05, body extent -2,-2 2,2, height 1
FP-RJE0020B-MFG [mm]
  rrect50% 0.6x0.2 smd paste+0 mask+0: 1(-1.4,0.9) 2(-1.4,0.45) 3(-1.4,0) 4(-1.4,-0.45) 5(-1.4,-0.9) 11(1.4,-0.9) 12(1.4,-0.45) 13(1.4,0) 14(1.4,0.45) 15(1.4,0.9)
  rrect50% 0.2x0.6 smd paste+0 mask+0: 6(-0.9,-1.4) 7(-0.45,-1.4) 8(0,-1.4) 9(0.45,-1.4) 10(0.9,-1.4) 16(0.9,1.4) 17(0.45,1.4) 18(0,1.4) 19(-0.45,1.4) 20(-0.9,1.4)
  rrect11% 0.926x0.975 smd paste+0 mask+0: 21(0.123,-0.007)
  silkscreen extent -2.1,-1.55 1.55,1.75, body extent -1.5,-1.5 1.5,1.5, height 1
IHLP2525EZ [mil]
  rect 95x135 smd: 1(-115,0) 2(115,0)
  silkscreen extent -128,-128 128,128, body extent -145,-133 142,133, height 193
LED_0603 [mil] "LED 0603"
  rect 32x32 smd: 1(-35,0) 2(35,0)
  silkscreen extent -60,-25 60,25, body extent -31,-16 32,16, height 28
NIC-CAPA2-6.3X7.7_V [mm] "Aluminum Electrolytic Capacitor, Diameter 6.3mm, Height 8mm, Pitch 5.4mm"
  rect 3.5x1.6 smd: 1(-2.7,0) 2(2.7,0)
  silkscreen extent -3.4,-3.4 3.4,3.4, body extent -3.14,-3.12 3.14,3.15, height 8
ONSC-SOIC-8-751BD-01_M [mm] "SOIC, 8-Leads, Body 4.90x3.90mm, Pitch 1.27mm, IPC Low Density"
  oval 1.65x0.65 smd: 1(-2.825,1.905) 2(-2.825,0.635) 3(-2.825,-0.635) 4(-2.825,-1.905) 5(2.825,-1.905) 6(2.825,-0.635) 7(2.825,0.635) 8(2.825,1.905)
  silkscreen extent -2.95,-2.5 1.6,2.9, body extent -3,-2.5 3,2.5, height 1.75
"PW (R-PDSO-G14)" [mm] "TI 14-TSSOP Package"
  rect 0.35x1.6 smd: 1(-1.95,-2.8) 2(-1.3,-2.8) 3(-0.65,-2.8) 4(0,-2.8) 5(0.65,-2.8) 6(1.3,-2.8) 7(1.95,-2.8) 8(1.95,2.8) 9(1.3,2.8) 10(0.65,2.8) 11(0,2.8) 12(-0.65,2.8) 13(-1.3,2.8) 14(-1.95,2.8)
  silkscreen extent -2.5,-1.7 2.5,1.7, body extent -2.55,-3.2 2.55,3.2, height 1.2
RESISTOR_0402 [mm] "Resistor 0402"
  rect 0.55x0.75 smd: 1(-0.475,0) 2(0.475,0)
  silkscreen extent -1.02,-0.64 1.02,0.64, body extent -0.5,-0.25 0.5,0.25, height 0.25
RESISTOR_0603 [mil] "Resistor 0603"
  rect 40x45 smd: 1(-33.5,0) 2(33.5,0)
  silkscreen extent -65,-35 65,35, body extent -31,-16 31,16, height 16
SAMTEC_ESQ-120-XX-X-D-XX [mm]
  rect 1.53x1.53 / inner round 1.53 / far side rect 1.53x1.53 hole 1.02: 01(24.13,-1.27)
  round 1.53 hole 1.02: 02(24.13,1.27) 03(21.59,-1.27) 04(21.59,1.27) 05(19.05,-1.27) 06(19.05,1.27) 07(16.51,-1.27) 08(16.51,1.27) 09(13.97,-1.27) 10(13.97,1.27) 11(11.43,-1.27) 12(11.43,1.27) 13(8.89,-1.27) 14(8.89,1.27) 15(6.35,-1.27) 16(6.35,1.27) 17(3.81,-1.27) 18(3.81,1.27) 19(1.27,-1.27) 20(1.27,1.27) 21(-1.27,-1.27) 22(-1.27,1.27) 23(-3.81,-1.27) 24(-3.81,1.27) 25(-6.35,-1.27) 26(-6.35,1.27) 27(-8.89,-1.27) 28(-8.89,1.27) 29(-11.43,-1.27) 30(-11.43,1.27) 31(-13.97,-1.27) 32(-13.97,1.27) 33(-16.51,-1.27) 34(-16.51,1.27) 35(-19.05,-1.27) 36(-19.05,1.27) 37(-21.59,-1.27) 38(-21.59,1.27) 39(-24.13,-1.27) 40(-24.13,1.27)
  silkscreen extent -25.66,-2.47 26.5,2.47, body extent -25.65,-2.54 25.65,2.54, height 16.14
SOD-123 [mm] "Schottky Diode SOD-123"
  rrect50% 1.2x1.22 smd: 1(-1.635,0) 2(1.635,0)
  silkscreen extent -2.79,-1.14 2.79,1.14, body extent -1.95,-0.9 1.95,0.9, height 1.18
SOIC-8 [mm] "SOIC, 8-Leads, Body 4.90x3.90mm, Pitch 1.27mm, IPC Medium Density"
  oval 1.45x0.6 smd: 1(-2.725,1.905) 2(-2.725,0.635) 3(-2.725,-0.635) 4(-2.725,-1.905) 5(2.725,-1.905) 6(2.725,-0.635) 7(2.725,0.635) 8(2.725,1.905)
  silkscreen extent -2.85,-2.5 1.6,2.88, body extent -3,-2.5 3,2.5, height 1.75
SOIC-14 [mm] "SOIC, 14-Leads, Body 8.65x3.90mm, Pitch 1.27mm, IPC Medium Density"
  oval 1.45x0.6 smd: 1(-2.725,3.81) 2(-2.725,2.54) 3(-2.725,1.27) 4(-2.725,0) 5(-2.725,-1.27) 6(-2.725,-2.54) 7(-2.725,-3.81) 8(2.725,-3.81) 9(2.725,-2.54) 10(2.725,-1.27) 11(2.725,0) 12(2.725,1.27) 13(2.725,2.54) 14(2.725,3.81)
  silkscreen extent -2.85,-4.35 1.6,4.79, body extent -3,-4.4 3,4.4, height 1.7
SOT-23-3 [mil]
  rect 22x50 smd paste+0 mask+4: 1(-37.5,-41) 2(37.5,-41) 3(0,41)
  silkscreen extent -65,-33 65,33, body extent -60,-52 60,52, height 44
TESTPOINT_1.2MM [mm]
  round 1.2 smd: TP(0,0)
XDCR_SHT41-AD1B-R2 [mm] "Sensirion AG SHT14 Sensor Humidity/Temp"
  rect 0.5x0.3 smd: 1(-0.7,0.4) 2(-0.7,-0.4) 3(0.7,-0.4) 4(0.7,0.4)
  silkscreen extent -1.45,-0.87 0.75,1.01, body extent -0.75,-0.75 0.75,0.75, height 0.54

## Part data
C2 C5 C15 C26 C30 C31: library part CAPACITOR_1uF_0402, "Cap 1uF 16V +/-10% / Ceramic 0402", Supplier Part Number 1=478-0402YD105KAT4ADKR-ND, Tolerance="+/- 10%", Voltage=16V, Made By="Robert Pafford", Supplier 1=Digi-Key
C3 C6 C10 C14 C16 C17 C18 C19 C20 C21 C25 C27 C28 C29 C32 C33 C34 C38 C39 C40 C41: library part CAPACITOR_0.1uF_0402, "Cap 100nF 25V +/-10% / Ceramic 0402", Supplier Part Number 1=478-7868-1-ND, Tolerance="+/- 10%", Voltage=25V, Made By="Robert Pafford", Supplier 1=Digi-Key
C4: library part CAPACITOR_10uF_0603, "Cap 10uF 6.3V +/-20% / Ceramic 0603", Supplier Part Number 1=1276-1119-1-ND, Tolerance="+/- 20%", Value (uF)="10 uF", Voltage=6.3V, ComponentLink1Description=Digikey, ComponentLink1URL=https://www.digikey.com/en/products/detail/samsung-electro-mechanics/CL10A106MQ8NNNC/3886777, Made By="Flip B", Supplier 1=Digi-Key
C7: library part CAPACITOR_1uF_0603_25V, "Cap 1uF 25V +/-10% / Ceramic 0603", Supplier Part Number 1=1276-1102-1-ND, Tolerance="+/- 10%", Voltage=16V, Made By="Flip B", Supplier 1=Digikey
C8: library part CMP-0687-00063-1, "Aluminum Electrolytic Capacitor, UD Series, Low Impedance, 100 uF, 25 V, + / - 20%, -55 to 105 degC, Chip Type, 6.3 x 7.7 mm D x L, Pb-Free, Reel", Manufacturer=Nichicon, Rated Capacitance="100 uF", Rated Ripple Current (at 100kHz)="280 mA", Rated Voltage="25 V", Tolerance Rated Capacitance="-20 to 20%", ComponentLink1Description="Manufacturer URL", ComponentLink1URL=http://www.nichicon.co.jp/, ComponentLink2Description=Datasheet, ComponentLink2URL=http://products.nichicon.co.jp/en/pdf/XJA043/e-ud.pdf, ComponentLink3Description="Package Specification", ComponentLink3URL=http://products.nichicon.co.jp/en/pdf/XJA043/e-ud.pdf, DatasheetVersion=08/2012, Diameter="6.3 mm", Endurance Time="2000 h", Impedance="0.34 Ohm", Length="7.7 mm", Mounting Technology="Surface Mount", PackageDescription="2-Pin Surface Mount Device, Diameter 6.3 mm, Height 7.7 mm, Pitch 5.4 mm", PackageReference=CAPAE-D6.3H7.7, Packing="Dia382mm Reel", PartNumber=UUD1E101MCL1GS, RoHS=TRUE
C9: library part CAPACITOR_0.022uF_0402, "Cap 22nF 25V +/-10% / Ceramic 0402", Supplier Part Number 1=445-1261-1-ND, Tolerance="+/- 10%", Voltage=25V, Made By="Robert Pafford", Supplier 1=Digi-Key
C11 C22: library part CAPACITOR_0.0001uF_0402, "Cap 100pF 25V +/-10% / Ceramic 0402", Supplier Part Number 1=399-C0402C101K3GAC7867CT-ND, Tolerance="+/- 10%", Voltage=25V, Made By="Robert Pafford", Supplier 1=Digikey
C12: library part CMP-06035-015661-1, "Chip Multilayer Ceramic Capacitors for General Purpose, 1206, 47uF, X5R, 15%, 10%, 10V", Capacitance=47uF, Case Code (Imperial)=1206, Case Code (Metric)=3216, Dielectric=X5R, Max Operating Temperature=85°C, Min Operating Temperature=-55°C, Package Quantity=2000, Tolerance=10%, Voltage=10V, Case/Package=1206, Depth=1.6mm, Height=1.6mm, Lead Free="Lead Free", Length=3.2mm, Material=Ceramic, Mount="Surface Mount", Packaging="Tape and Reel", REACH SVHC="No SVHC", Termination=SMD/SMT, Thickness=0.071inch, Voltage Rating=10V, Voltage Rating (DC)=10V, Width=1.6mm
C13 C23 C24: library part CMP-2000-06038-3, "Multilayer Ceramic Capacitors 22μF ±20% 35V X5R SMD 0805", Capacitance=22uF, Case Code (Imperial)=0805, Case Code (Metric)=2012, Dielectric=X5R, Dielectric Material=Ceramic, Max Operating Temperature=85°C, Min Operating Temperature=-55°C, Package Quantity=2000, Tolerance=20%, Voltage Rating=35V, Case/Package=0805, Height=1.25mm, Lead Free="Lead Free", Length=0.079inch, Mount="Surface Mount", Packaging="Tape and Reel", REACH SVHC="No SVHC", RoHS Compliant=Yes, Series=C, Termination=SMD/SMT, Thickness=0.057inch, Voltage Rating (DC)=35V, Weight=0.000194oz, Width=0.049inch
C35: library part CAPACITOR_0.0047uF_0402, "4700 pF +/-10% 25V Ceramic Capacitor X7R 0402", Supplier Part Number 1=478-6195-1-ND, Tolerance="+/- 10%", Voltage=25V, Made By="Robert Pafford", Supplier 1=Digi-Key
C36 C37: library part CAPACITOR_0.000027uF_0402, "Cap 27pF 50V +/-5% / Ceramic 0402", Supplier Part Number 1=445-5589-1-ND, Tolerance="+/- 5%", Voltage=50V, Made By="Robert Pafford", Supplier 1=Digi-Key
D1 D2 D3: library part LED_Green_0603_3.2V, "LED Green Vf= 3.2V If = 0.025A / 150060GS75000", Color=Green, Forward Current=25mA, Forward Voltage=3.2V, Package=0603, Supplier Part Number 1=732-4971-1-ND, ComponentLink1Description=Datasheet, ComponentLink1URL=https://www.we-online.de/katalog/datasheet/150060GS75000.pdf, Made By="Flip B", Supplier 1=Digi-Key
D4: "53.3V Clamp 28.1A Ipp Tvs Diode Surface Mount SMC (DO-214AB)", Package=None, Supplier Part Number 1=SMCJ33CABCT-ND, Arrow_Electronics-Purchase-URL=https://snapeda.com/shop?store=Arrow+Electronics&id=4833712, Availability=Good, DigiKey-Purchase-URL=https://snapeda.com/shop?store=DigiKey&id=4833712, MF="Bourns Inc.", Mouser-Purchase-URL=https://snapeda.com/shop?store=Mouser&id=4833712, MP=SMCJ33CA, Price=None, SnapEDA_Link=https://www.snapeda.com/parts/SMCJ33CA/Bourns/view-part/4833712/?ref=snap, Supplier 1=Digikey
D5: "Zener Diode", Package=SOD-123, Power=410mW, Supplier Part Number 1=MMSZ4684T1GOSCT-ND, Voltage - Zener=10V, ComponentLink1Description=Datasheet, ComponentLink1URL=https://www.panjit.com.tw/upload/datasheet/BZT52-C2V4_SERIES.pdf, Made By="Nathan A", Supplier 1=Digikey
J1: "ESQ - Samtec 2.54mm Elevated Dual Row Socket Strip 7.36mm Contact. 11.05mm Profile (13)", Package=None, Supplier Part Number 1=SAM9318-ND, Availability="In Stock", Check_prices=https://www.snapeda.com/parts/ESQ-120-13-L-D/Samtec+Inc./view-part/?ref=eda, MF=Samtec, MP=ESQ-120-13-L-D, Price=None, Purchase-URL=https://pricing.snapeda.com/search/part/ESQ-120-13-L-D/?ref=eda, SnapEDA_Link=https://www.snapeda.com/parts/ESQ-120-13-L-D/Samtec+Inc./view-part/?ref=snap, Supplier 1=Digikey
J2: library part FFC_16POS_0.5MM_R/A_TOP, "16 Position FPC Connector Contacts, Top 0.02\" (0.5mm) Surface Mount, Right Angle, Gold Contacts", Max Current=0.5A, Supplier Part Number 1=HFK116CT-ND, Contact Plating=Gold, FFC Type="ZIF Locking", Made By="Robert Pafford", Orientation="Top R/A", Pin Count=16, Supplier 1=Digi-Key
J3: library part CMP-03365-000002-1, "CONN FEMALE 67POS 0.020 GOLD", Current Rating=0.5A, Manufacturer="TE Connectivity", Package=0, Temperature="-40°C to +80°C", Temperature Range High=+80°C, Temperature Range Low=-40°C, Voltage Rating=50V, Automotive=No, Category=Conn, ComponentLink2Description=Datasheet, ComponentLink2URL=https://www.te.com/commerce/DocumentDelivery/DDEController?Action=showdoc&DocId=Customer+Drawing%7F2199230%7FB3%7Fpdf%7FEnglish%7FENG_CD_2199230_B3.pdf%7F2199230-4, Conn Gender=Female, Conn Orientation="Right Angle", Contact Material=Gold,Nickel, Device Class L1=Connectors, Device Class L2="Card Edge Connectors", Device Class L3=unset, Digikey Description="CONN FEMALE 67POS 0.020 GOLD", Height=4.2mm, Is Female=yes, Lead Free=Yes, Manufacturer Part Number=2199230-4, Mouser Description="PCI Express / PCI Connectors .5PITCH 4.2H KEY E EMBOSS NGFF MINICARD", Number of Contacts=67, Number Of Rows=2, Octopart=https://octopart.com/2199230-4-te+connectivity-46436156, Pitch=0.5mm, RoHS=TRUE
J4: library part CMP-04776-000244-1, "CONN HEADER SMD R/A 4POS 3MM", Case/Package=0406, Color=Black, Contact Resistance=10mR, Current Rating=5A, Flammability Rating="UL94 V-0", Max Operating Temperature=105°C, Max Voltage Rating (DC)=250.25kV, Min Operating Temperature=-40°C, Package Quantity=1800, Voltage Rating=600V, Voltage Rating (DC)=250V, Contact Material=Brass, Contact Plating=Tin, Gender=Male, Glow Wire Compliant=Compliant, Halogen Free="Low Halogen", Housing Material=Thermoplastic, Mount="Surface Mount", Number of Circuits=4, Number of Contacts=4, Number of Positions=4, Number Of Rows=2, Orientation="Right Angle", Packaging="Tape and Reel", Pitch=3mm, RoHS Compliant=Yes, Row Spacing=3mm, Series="Micro-Fit 3.0", Termination=SMD/SMT
J5 J6: library part CMP-04776-000725-1, "CONN HEADER SMD R/A 2POS 1.25MM"
J7: library part CONN_MICROUSB, "Amphenol Micro USB-B / USB2.0 5 Pin Right Angle SMD", Color=Silver, Current Per Pin=1.8A, Manufacturer=Amphenol, Supplier Part Number 1=609-4613-1-ND, ComponentLink1Description=Datasheet, ComponentLink1URL=https://cdn.amphenol-icc.com/media/wysiwyg/files/documentation/datasheet/inputoutput/io_usb_micro.pdf?__cf_chl_jschl_tk__=05693735e19256298f6ef6ca2bb2e65c376a4f56-1625503833-0-Abitsb0-ufjOXJYs_S3J3r2iTn-nObalbmXUksF1VvO_h_WEmRdMlUD1I8-hmWSEVWzY1pirKnrPZWfgY3851qyBZe5ZvnNQePLGIzUgdEIQBVUyW36RsbYpDLEWxJ4horD-5gChFgobLYqwmG5aHl0E8lIn_twwPPrOxilK2gP0q9t_CNOs_u5fMqXvXUrlsOv8tIE2NRlu6NVP8qtkL2GjhlkeTUbDMF8WvvpPDTFOgvZ4Y16Ej8F8AhWos88mo5B1HssXozw0XrkJQIqERITUu6rqloz9kf4ZzhBHtDAt-IkiAFY_Ds9SW8FYKKTtINJVpHZQ6Gyu1FFM4Dc9MO0maE8_mmNcwlxqyRoRk_MPWW8VyByXWM5RSp52jteRKw7FeI9WIYvCbPAOy0Eyib-aseIQsnGbglBcUY6_2xp8GYaJM38H3dNvBPsSOfJBPndKedwKHllxjkucXn6xsN0sDXkpGN-cu8_2bDTJ0g-uUucKSCooYX-ApSDNGpkA_p9zv1SOAD8c0zaZVmtiBsN75QpVz2rzq9_BFxOywPvR, Configuration="Right Angle", Created By="Flip B", Number of Positions=5, Pitch=0.65mm, Series=10118192, Supplier 1=Digi-Key
L1 L2: library part INDUCTOR_1.5uH_IHLP2525EZ_1, "Inductor Shielded 1.5uH 12A +/-20%", Current Rating=12A, DC Resistance=9mOhm, Supplier Part Number 1=541-4344-1-ND, Tolerance="+/- 20%", Made By="Robert Pafford", Supplier 1=Digikey
MP1: library part M3_STANDOFF_78614025360, "WE-SMSA SMT Spacer Studs Automotive, OD 6mm, ID 4.2mm, M3 x 2.5mm", Manufacturer="Wurth Elektronik", Manufacturer Part Number=78614025360, Operating Temperature Max=150°C, Operating Temperature Min=-55°C, Supplier Part Number 1=732-78614025360CT-ND, Category=Assembly, ComponentLink1Description="Website Link", ComponentLink1URL=https://www.we-online.com/redexpert/article/78614025360?ad, ComponentLink2Description="Datasheet Link", ComponentLink2URL=https://www.we-online.com/redexpert/spec/78614025360?ad, Height=2.5mm, Inner Diameter=4.2mm, Match Code=WE-SMSA, Material=Steel, Mount="Surface Mount", Outer Diameter=6mm, Packaging="Tape and Reel", Solder Cream Thickness Min=150µm, Supplier 1=Digikey, Surface=Tin, Thread=M3, Tightenning Torque Max=0.5N*m
Q1: library part AO3404A, "N-Channel 30 V 5.8A (Ta) 1.4W (Ta) Surface Mount SOT-23-3", Amp Rating="5.8 A", Package=SOT23-3L, Power Dissipation="1.4W (Ta)", Supplier Part Number 1=785-1004-1-ND, Created By="Dylan T", FET Type=N-Channel, Manufacturer _Part_Number=AO3404A, Rds (on)="28mOhm @ 5.8A, 10V", SourceLibrary=ON_Semiconductor_2020-01-13, Supplier 1=Digi-Key, Vdss=30V, Vendor="Alpha & Omega Semiconductor Inc.", Vgs (Max)="3V @ 5.8A, 10V", Vgs (th)="3V @ 250µA"
Q2: library part CMP-04962-000024-1, "MOSFET N-CH 100V 50A 8VSON", Continuous Drain Current (ID)=50A, Drain to Source Voltage (Vdss)=100V, Gate to Source Voltage (Vgs)=20V, Input Capacitance=1.68nF, Max Operating Temperature=150°C, Max Power Dissipation=2.8W, Min Operating Temperature=-55°C, Contact Plating=Copper, Fall Time=3ns, Lead Free="Contains Lead", Mount="Surface Mount", Number of Pins=8, Packaging=Rail/Tube, Rds On Max=14.5mR, Rise Time=3ns, RoHS Compliant=Yes, Turn-Off Delay Time=10ns, Turn-On Delay Time=5ns
Q3: library part CMP-013-00021-4, "N-Channel Logic Level Enhancement Mode Field Effect Transistor, 220 mA, 50 V, -55 to 150 degC, 3-Pin SOT-23, RoHS, Tape and Reel", Case/Package=TO-236-3, Input Capacitance=27pF, Manufacturer=Fairchild, Max Operating Temperature=150°C, Min Operating Temperature=-55°C, Nominal Dual Supply Voltage=50V, Package Description="3-Pin Small Outline Transistor, Body 2.92 x 1.325 mm, Pitch 0.95 mm", Package Quantity=1, Package Reference=SOT23-3, Package Version="Rev. 12, 03/2016", Power=360mW, Resistance=0.7Ohm, Datasheet URL=https://www.fairchildsemi.com/datasheets/BS/BSS138.pdf, Datasheet Version="Rev. C, 10/2005", Elements=1, Mounting Technology=SM, Nominal Vgs=1.3V, Packaging=TapeandReel, Pins=3, Rds On Max=3.5Ohm, RoHS Compliant=True, Typical Rise Time=9ns
R1 R2 R3 R4 R5 R7 R8 R27 R44 R45 R46: library part RESISTOR_0_0402, "RES 0 OHM 1% 1/16W 0402", Supplier Part Number 1=13-AC0402FR-070RLCT-ND, Tolerance="+/- 1%", Value  (Ohms)=0, Made By="Robert Pafford", Supplier 1=Digikey, Wattage=1/16W
R6 R10 R24 R28 R34: library part RESISTOR_10K_0402, "RES 10k OHM 1% 1/16W 0402", Digikey Part Numer=CR0603-JW-104ELFTR-ND, Supplier Part Number 1=YAG3436CT-ND, Tolerance="+/- 1%", Value  (Ohms)=10K, Made By="Robert Pafford", Supplier=Digikey, Supplier 1=Digi-Key, Wattage=1/16W
R9: library part RESISTOR_2.2K_0402, "RES 2.2K OHM 1% 1/16W 0402", Supplier Part Number 1=311-2.20KLRCT-ND, Tolerance="+/- 1%", Value  (Ohms)=2.2K, Made By="Megan McCabe", Supplier 1=Digikey, Wattage=1/16W
R11 R18 R23: library part RESISTOR_100K_0402, "RES 100k OHM 1% 1/16W 0402", Supplier Part Number 1=YAG3434CT-ND, Tolerance="+/- 1%", Value  (Ohms)=100K, Made By="Robert Pafford", Supplier 1=Digikey, Wattage=1/16W
R12 R19: library part RESISTOR_160K_0402, "RES 160k OHM 1% 1/16W 0402", Supplier Part Number 1=YAG2996CT-ND, Tolerance="+/- 1%", Value  (Ohms)=160K, Made By="Robert Pafford", Supplier 1=Digikey, Wattage=1/16W
R13 R39: library part RESISTOR_330K_0402, "RES 330k OHM 1% 1/16W 0402", Supplier Part Number 1=311-330KLRCT-ND, Tolerance="+/- 1%", Value  (Ohms)=330K, Made By="Robert Pafford", Supplier 1=Digikey, Wattage=1/16W
R14 R40: library part RESISTOR_113K_0402, "RES 113k OHM 1% 1/16W 0402", Supplier Part Number 1=YAG2368CT-ND, Tolerance="+/- 1%", Value  (Ohms)=113K, Made By="Robert Pafford", Supplier 1=Digikey, Wattage=1/16W
R15: library part RESISTOR_15K_0402, "RES 15k OHM 1% 1/16W 0402", Supplier Part Number 1=311-15.0KLRCT-ND, Tolerance="+/- 1%", Value  (Ohms)=15K, Made By="Robert Pafford", Supplier 1=Digikey, Wattage=1/16W
R16 R17 R22 R42 R43: library part RESISTOR_56K_0402, "RES 56k OHM 1% 1/16W 0402", Supplier Part Number 1=YAG3501CT-ND, Tolerance="+/- 1%", Value  (Ohms)=56K, Made By="Robert Pafford", Supplier 1=Digi-Key, Wattage=1/16W
R20: library part RESISTOR_90.9K_0402, "RES 90.9k OHM 1% 1/16W 0402", Supplier Part Number 1=YAG5314CT-ND, Tolerance="+/- 1%", Value  (Ohms)=90.9K, Made By="Robert Pafford", Supplier 1=Digikey, Wattage=1/16W
R21: library part RESISTOR_20K_0402, "RES 20k OHM 1% 1/16W 0402", Supplier Part Number 1=YAG3454CT-ND, Tolerance="+/- 1%", Value  (Ohms)=20K, Made By="Robert Pafford", Supplier 1=Digikey, Wattage=1/16W
R25 R26: library part RESISTOR_60.4_0402, "RES 60.4 OHM 1% 1/16W 0402", Digikey Part Numer=CR0603-JW-104ELFTR-ND, Supplier Part Number 1=13-AC0402FR-0760R4LCT-ND, Tolerance="+/- 1%", Value  (Ohms)=60.4, Made By="Robert Pafford", Supplier=Digikey, Supplier 1=Digi-Key, Wattage=1/16W
R29 R30 R32 R33: library part RESISTOR_3.9K_0402, "RES 3.9k OHM 1% 1/16W 0402", Supplier Part Number 1=YAG3484CT-ND, Tolerance="+/- 1%", Value  (Ohms)=3.9K, Made By="Robert Pafford", Supplier 1=Digikey, Wattage=1/16W
R31: library part RESISTOR_1K_0402, "RES 1k OHM 1% 1/16W 0402", Digikey Part Numer=CR0603-JW-104ELFTR-ND, Supplier Part Number 1=13-AC0402FR-131KLCT-ND, Tolerance="+/- 1%", Value  (Ohms)=1K, Made By="Robert Pafford", Supplier=Digikey, Supplier 1=Digi-Key, Wattage=1/16W
R35: library part RESISTOR_470K_0603, "RES 470k OHM 5% 1/10W 0603", Supplier Part Number 1=RMCF0603JT470KCT-ND, Tolerance="+/- 5%", Value  (Ohms)=470K, ComponentLink1Description=Datasheet, ComponentLink1URL=https://www.bourns.com/docs/product-datasheets/CRxxxxx.pdf, Made By="Robert P", Supplier 1=Digi-Key, Wattage=1/10W
R36 R37: library part RESISTOR_4.7K_0603, "RES 4.7k OHM 5% 1/10W 0603", Digikey Part Numer=CR0603-JW-104ELFTR-ND, Supplier Part Number 1=RMCF0603JT4K70CT-ND, Tolerance="+/- 5%", Value  (Ohms)=4.7K, Made By="Robert Pafford", Supplier=Digikey, Supplier 1=Digi-Key, Wattage=1/10W
R38: library part RESISTOR_1M_0402, "RES 1M OHM 1% 1/16W 0402", Supplier Part Number 1=YAG3450CT-ND, Tolerance="+/- 1%", Value  (Ohms)=1M, Made By="Robert Pafford", Supplier 1=Digikey, Wattage=1/16W
R41: library part RESISTOR_3.09K_0402, "RES 3.09k OHM 1% 1/16W 0402", Supplier Part Number 1=13-AC0402FR-073K09LCT-ND, Tolerance="+/- 1%", Value  (Ohms)=3.09k, Made By="Robert Pafford", Supplier 1=Digikey, Wattage=1/16W
SW1: library part CAS-220TA_CAN_TERM, "GOLD SWITCH FLUSH SLIDE DPDT 100MA 6V", Current Rating="100 mA", Supplier Part Number 1=CAS220JCT-ND, Voltage Rating=6VDC, Contact Finish=Gold, Made By="Robert Pafford", Supplier 1=Digi-Key, Switch Function=DPDT
TP1 TP2 TP3 TP5: library part TESTPOINT, Made By="Robert Pafford"
TP4: library part TESTPOINT, "PCB Test Point", Made By="Robert Pafford"
U1 U3: library part CMP-04918-000702-1, "10-A SYNCHRONOUS STEP-DOWN REGUL"
U2: library part CMP-04910-000050-1, "POWER MANAGEMENT", RoHS Compliant=Yes
U4: library part CMP-0394-00928-2, "Single Output LDO, 200 mA, Fixed 1.8 V Output, 2 to 5.5 V Input, with Low IQ, 5-pin SC70 (DCK), -40 to 125 degC, Green (RoHS & no Sb/Br)", Manufacturer="Texas Instruments", Accuracy(%)=2, Code_JEDEC=MO-203, ComponentLink1Description="Manufacturer URL", ComponentLink1URL=http://www.ti.com/, ComponentLink2Description=Datasheet, ComponentLink2URL=http://www.ti.com/general/docs/lit/getliterature.tsp?genericPartNumber=TLV70018&fileType=pdf, ComponentLink3Description="Package Specification", ComponentLink3URL=http://www.ti.com/litv/pdf/mpds025f, DatasheetVersion=SLVSA00D, Eco-Plan="Green (RoHS & no Sb/Br)", Fixed Output Options(V)=1.8, Iout(Max)(A)=0.2, Iq(Typ)(mA)=0.03, Mounting Technology="Surface Mount", PackageDescription="5-Pin Plastic Small-Outline, Body 2 x 1.25 mm, Pitch 0.65 mm", PackageReference=DCK0005A, PackageVersion=4093553-3/G, PartNumber=TLV70018DCKR, SubFamily="Single Channel LDO", Vdo(Typ)(mV)=175, Vin(Max)(V)=5.5, Vin(Min)(V)=2, Vout Adj(Max)(V)=1.8, Vout Adj(Min)(V)=1.8
U5: "CANbus Controller CAN 2.0 SPI Interface 14-SOIC", Made By="Robert Pafford", Max FD Rate="8 Mbps"
U6: library part TJA1442AT, "CAN Interface IC High-Speed CAN Transceiver with Standby Mode", Supplier Part Number 1=771-TJA1442AT/0Z, Made By="Robert Pafford", Max Data Rate=5Mbps, Supplier 1=Mouser
U7: library part CMP-1679-00009-1, "I2C CMOS Serial EEPROM, 32 Kb, 1.7 to 5.5 V, -40 to 85 degC, 8-Pin SOIC (751BD), RoHS, Tape and Reel", Case\Package=TO-226-3, Frequency="300 MHz", Max Operating Temperature="150 degC", Max Power Dissipation="625 mW", Min Operating Temperature="-55 degC", Package Quantity=1000, ComponentLink1Description="Manufacturer URL", ComponentLink1URL=http://www.onsemi.com/, ComponentLink2Description=Datasheet, ComponentLink2URL=http://www.onsemi.com/pub_link/Collateral/CAT24C32-D.PDF, ComponentLink3Description="Package Specification", ComponentLink3URL=http://www.onsemi.com/pub_link/Collateral/751BD.PDF, DatasheetVersion="Rev. 24, 06/2015", Elements=1, Height="5.33 mm", hFE Min=100, Length="5.2 mm", Mount="Through Hole", PackageDescription="8-Pin Small Outline Integrated Circuit, Body 4.9 x 3.9 mm, Pitch 1.27 mm", PackageReference=SOIC-8-751BD-01, Packaging=Bulk, Pins=3, Radiation Hardening=No, REACH SVHC="No SVHC", RoHSCompliant=true, Vce Max="1 V", Weight="0.006314 oz", Width="4.19 mm"
U8: library part SHT41-AD1B-R2, "Digital Relative Humidity Temperature Sensor, Â±1.8 / max 2.5 %RH, Â±0.2 Â°C, Ultra-Low-Power", Package=None, Supplier Part Number 1=1649-SHT41-AD1B-R2CT-ND, Availability="In Stock", Check_prices=https://www.snapeda.com/parts/SHT41-AD1B-R2/Sensirion/view-part/?ref=eda, MF=Sensirion, MP=SHT41-AD1B-R2, Price=None, Purchase-URL=https://pricing.snapeda.com/search/part/SHT41-AD1B-R2/?ref=eda, SnapEDA_Link=https://www.snapeda.com/parts/SHT41-AD1B-R2/Sensirion/view-part/?ref=snap, Supplier 1=Digi-Key
U9: library part CMP-2000-04956-2, "IC TRNSLTR BIDIRECTIONAL 20TSSOP", Case/Package=TSSOP, High Level Output Current=-50mA, Low Level Output Current=50mA, Max Operating Temperature=85°C, Max Supply Voltage=5.5V, Min Operating Temperature=-40°C, Min Supply Voltage=1.2V, Nominal Supply Current=8uA, Output Current=620uA, Package Quantity=1, Quiescent Current=3uA, Contact Plating=Gold, Data Rate=60Mbps, Height=1.15mm, Lead Free="Lead Free", Length=6.5mm, Logic Function=Translator, Mount="Surface Mount", Number of Bits=8, Number of Channels=8, Number of Inputs=8, Number of Pins=20, Output Type=Voltage, Packaging="Tape and Reel", Propagation Delay=4.8ns, Radiation Hardening=No, REACH SVHC="No SVHC", Rise Time=6.3ns, RoHS Compliant=Yes, Series=-, Supply Current=8uA, Termination=SMD/SMT, Turn-On Delay Time=312ns, Weight=0.002716oz, Width=4.4mm
U10 U11 U12: "Voltage Level Translator Unidirectional 1 Circuit 4 Channel 200Mbps 14-TSSOP", Supplier Part Number 1=296-TXU0104QPWRQ1CT-ND, Voltage Range=1.1~5.5V, Channel Type=Unidirectional, Channels=4, Made By="Robert Pafford", Max Rate=200Mbps, Supplier 1=Digi-Key
Y1: library part CRYSTAL_20MHz_SMD, "20 MHz ±20ppm Crystal 18pF 100 Ohms 4-SMD, No Lead (3.2x2.5mm)", Frequency="20 MHz", Load Capacitance=18pF, Supplier Part Number 1=2151-RH100-20.000-18-2020-TRCT-ND, ESR="70 Ohms", Made By="Robert Pafford", Supplier 1=Digikey

## Free pads (board coordinates)
  round 1 hole 2.75 unplated: 1(13.5,13.5) 1(13.5,62.5) 1(71.5,13.5) 1(71.5,62.5)

## Via types
v1: diameter 0.5, hole 0.3, Top Layer to Bottom Layer, tented both sides, 342 vias
v2: diameter 0.65, hole 0.4, Top Layer to Bottom Layer, tented both sides, 12 vias
v3: diameter 0.8, hole 0.5, Top Layer to Bottom Layer, tented both sides, 3 vias

## Nets (pads, with @x,y where several pads share a name; then routed paths per layer and width w, separated by ;. In a path a pad name is that pad's centre, name@x,y a point inside that pad or via, vN(x,y) a via of type N, cw(c..) or ccw(c..) an arc to the next point about the centre after c; other vN are vias at no path point)
1V8: C18.1 C20.1 C29.1 C31.1 C40.1 TP3.TP U4.5 U9.2 U9.10 U10.8 U10.14 U11.8 U11.14 U12.1 | length 27.6
  Top Layer w0.3: v1(31.9,29.3) 31.9,33.362 32.013,33.475 v1(32.013,34.213)
  Bottom Layer w0.3: v1(31.9,29.3) 31.918,29.318 32.481,29.318 32.489,29.326 33.074,29.326 33.367,29.033 34.117,29.033 U9.2@34.125,29.025 ; v1(32.013,34.213) 32.025,34.225 U9.10@34.125,34.225 34.132,34.217 35.183,34.217 v1(35.2,34.2) ; U10.8@44.5,28.35 44.525,28.375 45.242,28.375 45.9,29.033 45.9,31.8 45.475,32.225 45,32.225 U10.14@44.975,32.25 ; U10.14@44.5,32.25 U10.14@44.975,32.25 ; C20.1@44.935,33.7 44.917,33.683 44.917,32.918 v1(44.9,32.9) 44.9,32.275 44.925,32.25 U10.14@44.975,32.25 ; C40.1@44.935,35.8 45.062,35.927 45.062,36.562 v1(45.1,36.6) 45.1,37.225 45.075,37.25 U12.1@45.01,37.25 ; U11.14@53.15,36 53.175,36.025 53.175,36.901 53.351,37.077 56.69,37.077 57.025,36.742 57.025,35.4 57.39,35.035 C29.1@58.5,35.035
  other v1: 51.5,34.4 51.5,35 51.5,35.6
3V3REG_AGND: C27.2 R21.2 R22.2 R23.2 R45.1 U3.13
3V3REG_SW: C21.1 L2.2 U3.6 U3.19 U3.20 | length 2
  Top Layer w0.2: U3.6@48.85,16.5 49.05,16.5 49.293,16.257 49.443,16.257 v1(49.5,16.2)
  Top Layer w0.3: C21.1@45.065,14.7 45.083,14.718 45.083,15.883 v1(45.1,15.9)
  other v1: 49,15.938 45.1,16.5
3V3REG_VCC: C26.1 R18.1 R19.1 U3.17 | length 12.8
  Top Layer w0.2: v1(44.5,20.9) 44.462,20.862 44.462,20.238 R19.1@44.425,20.2 44.425,19.355 44.835,18.945 C26.1@44.835,18.3 ; C26.1@44.815,18.3 45.265,17.85 U3.17@46.05,17.85 ; R18.1@51.375,17.9 51.387,17.912 51.387,18.588 v1(51.4,18.6)
  Bottom Layer w0.2: v1(44.5,20.9) 49.1,20.9 v1(51.4,18.6)
5V: C11.1 C12.1 C34.1 J1.02 J1.04 L1.1 R14.1 TP1.TP U6.3 | length 35.3
  Top Layer w0.2: R14.1@24.55,22.575 24.563,22.588 25.338,22.588 v1(25.35,22.6) 25.383,22.568 26.017,22.568 C11.1@26.05,22.535
  Top Layer w0.3: v1(19.3,50.6) 34.9,50.6 35.6,49.9 38.6,49.9 v1(39.6,50.9)
  Bottom Layer w0.2: v1(19.2,25.8) 19.2,24.4 21,22.6 v1(25.35,22.6)
  Bottom Layer w0.3: v1(39.6,50.9) 40.177,51.477 41.352,51.477 41.605,51.224 41.605,51.03 C34.1@41.735,50.9
  Bottom Layer w0.4: C34.1@41.735,50.9 41.735,50.15 42.07,49.815 42.07,49.39 U6.3@42.135,49.325
  other v1: 17,28.9 17.8,28.9 18.6,28.9 17.4,29.3 18.2,29.3 17,29.7 17.8,29.7 18.6,29.7 17.4,30.1 18.2,30.1 17,30.5 17.8,30.5 18.6,30.5
5V_EN: Q1.3 R13.2 R17.1 U1.12 | length 9.1
  Top Layer w0.2: U1.12@26.35,18.8 26.35,19.223 27.077,19.95 27.375,19.95 R17.1@27.443,20.018 ; v1(27.35,19.5) 27.35,19.581 27.443,19.674 R17.1@27.443,20.018 ; R17.1@27.55,20.125 R17.1@27.443,20.018
  Bottom Layer w0.2: v1(27.35,19.5) 27.35,19.472 27.725,19.097 ; R13.2@27.725,18.1 27.725,19.097 ; Q1.3@32.259,17.9 29.837,17.9 29.343,18.395 29.343,18.403 28.649,19.097 27.725,19.097
5VREG_AGND: C16.2 R15.2 R16.2 R17.2 R46.1 U1.13
5VREG_SW: C10.1 L1.2 U1.6 U1.19 U1.20 | length 2
  Top Layer w0.2: U1.6@27.3,16.5 27.5,16.5 27.743,16.257 27.893,16.257 v1(27.95,16.2)
  Top Layer w0.3: C10.1@23.515,14.7 23.533,14.718 23.533,15.883 v1(23.55,15.9)
  other v1: 27.45,15.938 23.55,16.5
5VREG_VCC: C15.1 R11.1 R12.1 U1.17 | length 12.8
  Top Layer w0.2: v1(22.95,20.9) 22.913,20.863 22.913,20.238 R12.1@22.875,20.2 22.875,19.355 23.285,18.945 C15.1@23.285,18.3 ; C15.1@23.265,18.3 23.715,17.85 U1.17@24.5,17.85 ; R11.1@29.825,17.9 29.838,17.913 29.838,18.588 v1(29.85,18.6)
  Bottom Layer w0.2: v1(22.95,20.9) 27.55,20.9 v1(29.85,18.6)
15V: C8.1 C13.1 C14.1 C24.1 C25.1 R13.1 R35.1 U1.2 U1.3 U1.4 U1.5 U2.17 U2.18 U3.2 U3.3 U3.4 U3.5 | length 18.7
  Bottom Layer w0.2: R13.1@28.675,18.1 28.808,17.967 29.296,17.967 32.061,15.202 32.061,14.739 v1(32.1,14.7) ; R35.1@66.427,45.772 66.49,45.772 66.898,45.364 R35.1@66.898,45.3
  Bottom Layer w0.3: v2(57.2,37.5) 65,45.3 R35.1@66.898,45.3
  other v1: 44.8,53.4 45.8,53.4 45.3,53.7 44.8,54 45.8,54 45.3,54.3 44.8,54.6 45.8,54.6
CAM_TRIGGER1_1V8: J5.1 U11.12 | length 71.9
  Top Layer w0.2: J5.1@14.25,55.625 15.275,55.625 16.5,54.4 16.5,32.8 17.3,32 21.181,32 25.5,27.681 v1(25.5,27.6) ; v1(47.1,27.104) 50.896,30.9 v1(52.1,30.9)
  Bottom Layer w0.2: v1(25.5,27.6) 27.5,27.6 29.333,25.767 45.763,25.767 v1(47.1,27.104) ; v1(52.1,30.9) 53.379,30.9 54.45,31.971 U11.12@54.45,36
CAM_TRIGGER2_1V8: J6.1 U11.11 | length 24.6
  Top Layer w0.2: v1(63.3,31) 68.721,25.579 68.721,21.679 69.525,20.875 J6.1@70.75,20.875
  Bottom Layer w0.2: U11.11@55.1,36 55.1,35.375 55.34,35.135 55.34,35.114 55.942,34.512 57.072,34.512 60.584,31 v1(63.3,31)